# Altium PCB updated_pcb_file.PcbDoc (part 1 of 5)
Units mil, origin at the board's own origin, x right, y up, seen from the top; angles counter-clockwise.
Board outline 3385.83 x 2125.98 mil, 4 copper layers (L1 (TOP), L2 (GND), L3 (PWR), L4 (BOTTOM)), stack 38.228 mil thick; 154 components, 143 nets, 726 pads, 326 vias.
Unrouted connection lines stored in the file: 46.
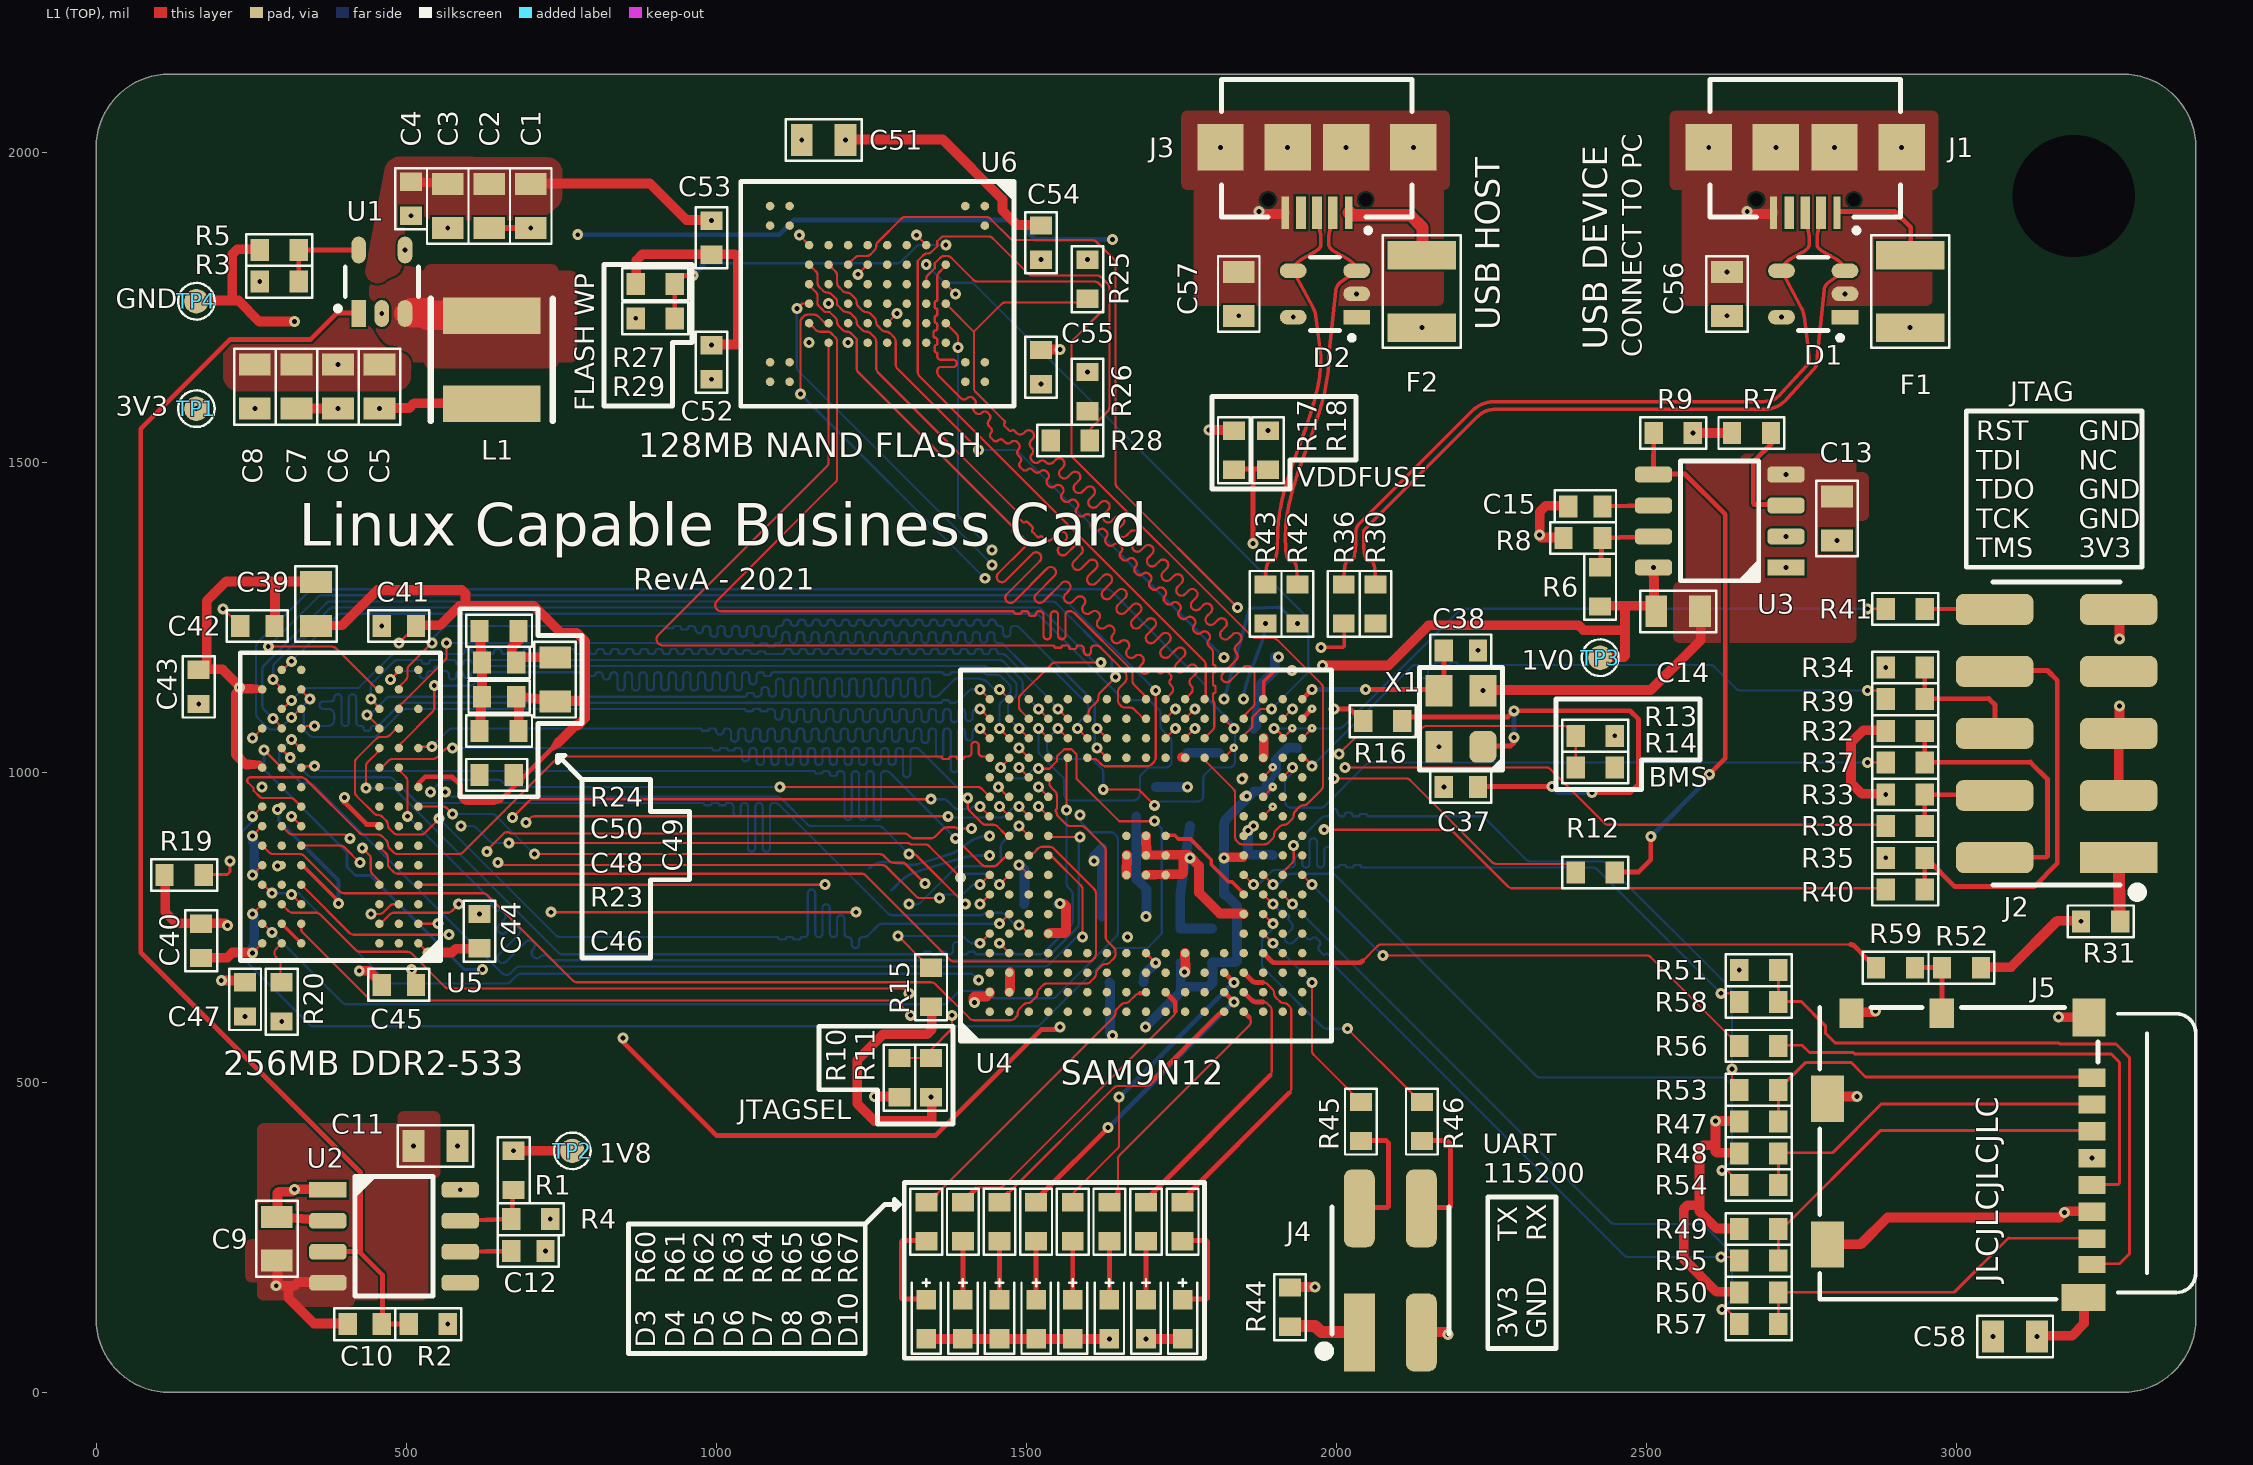
[diagram p0: L1 (TOP) view]
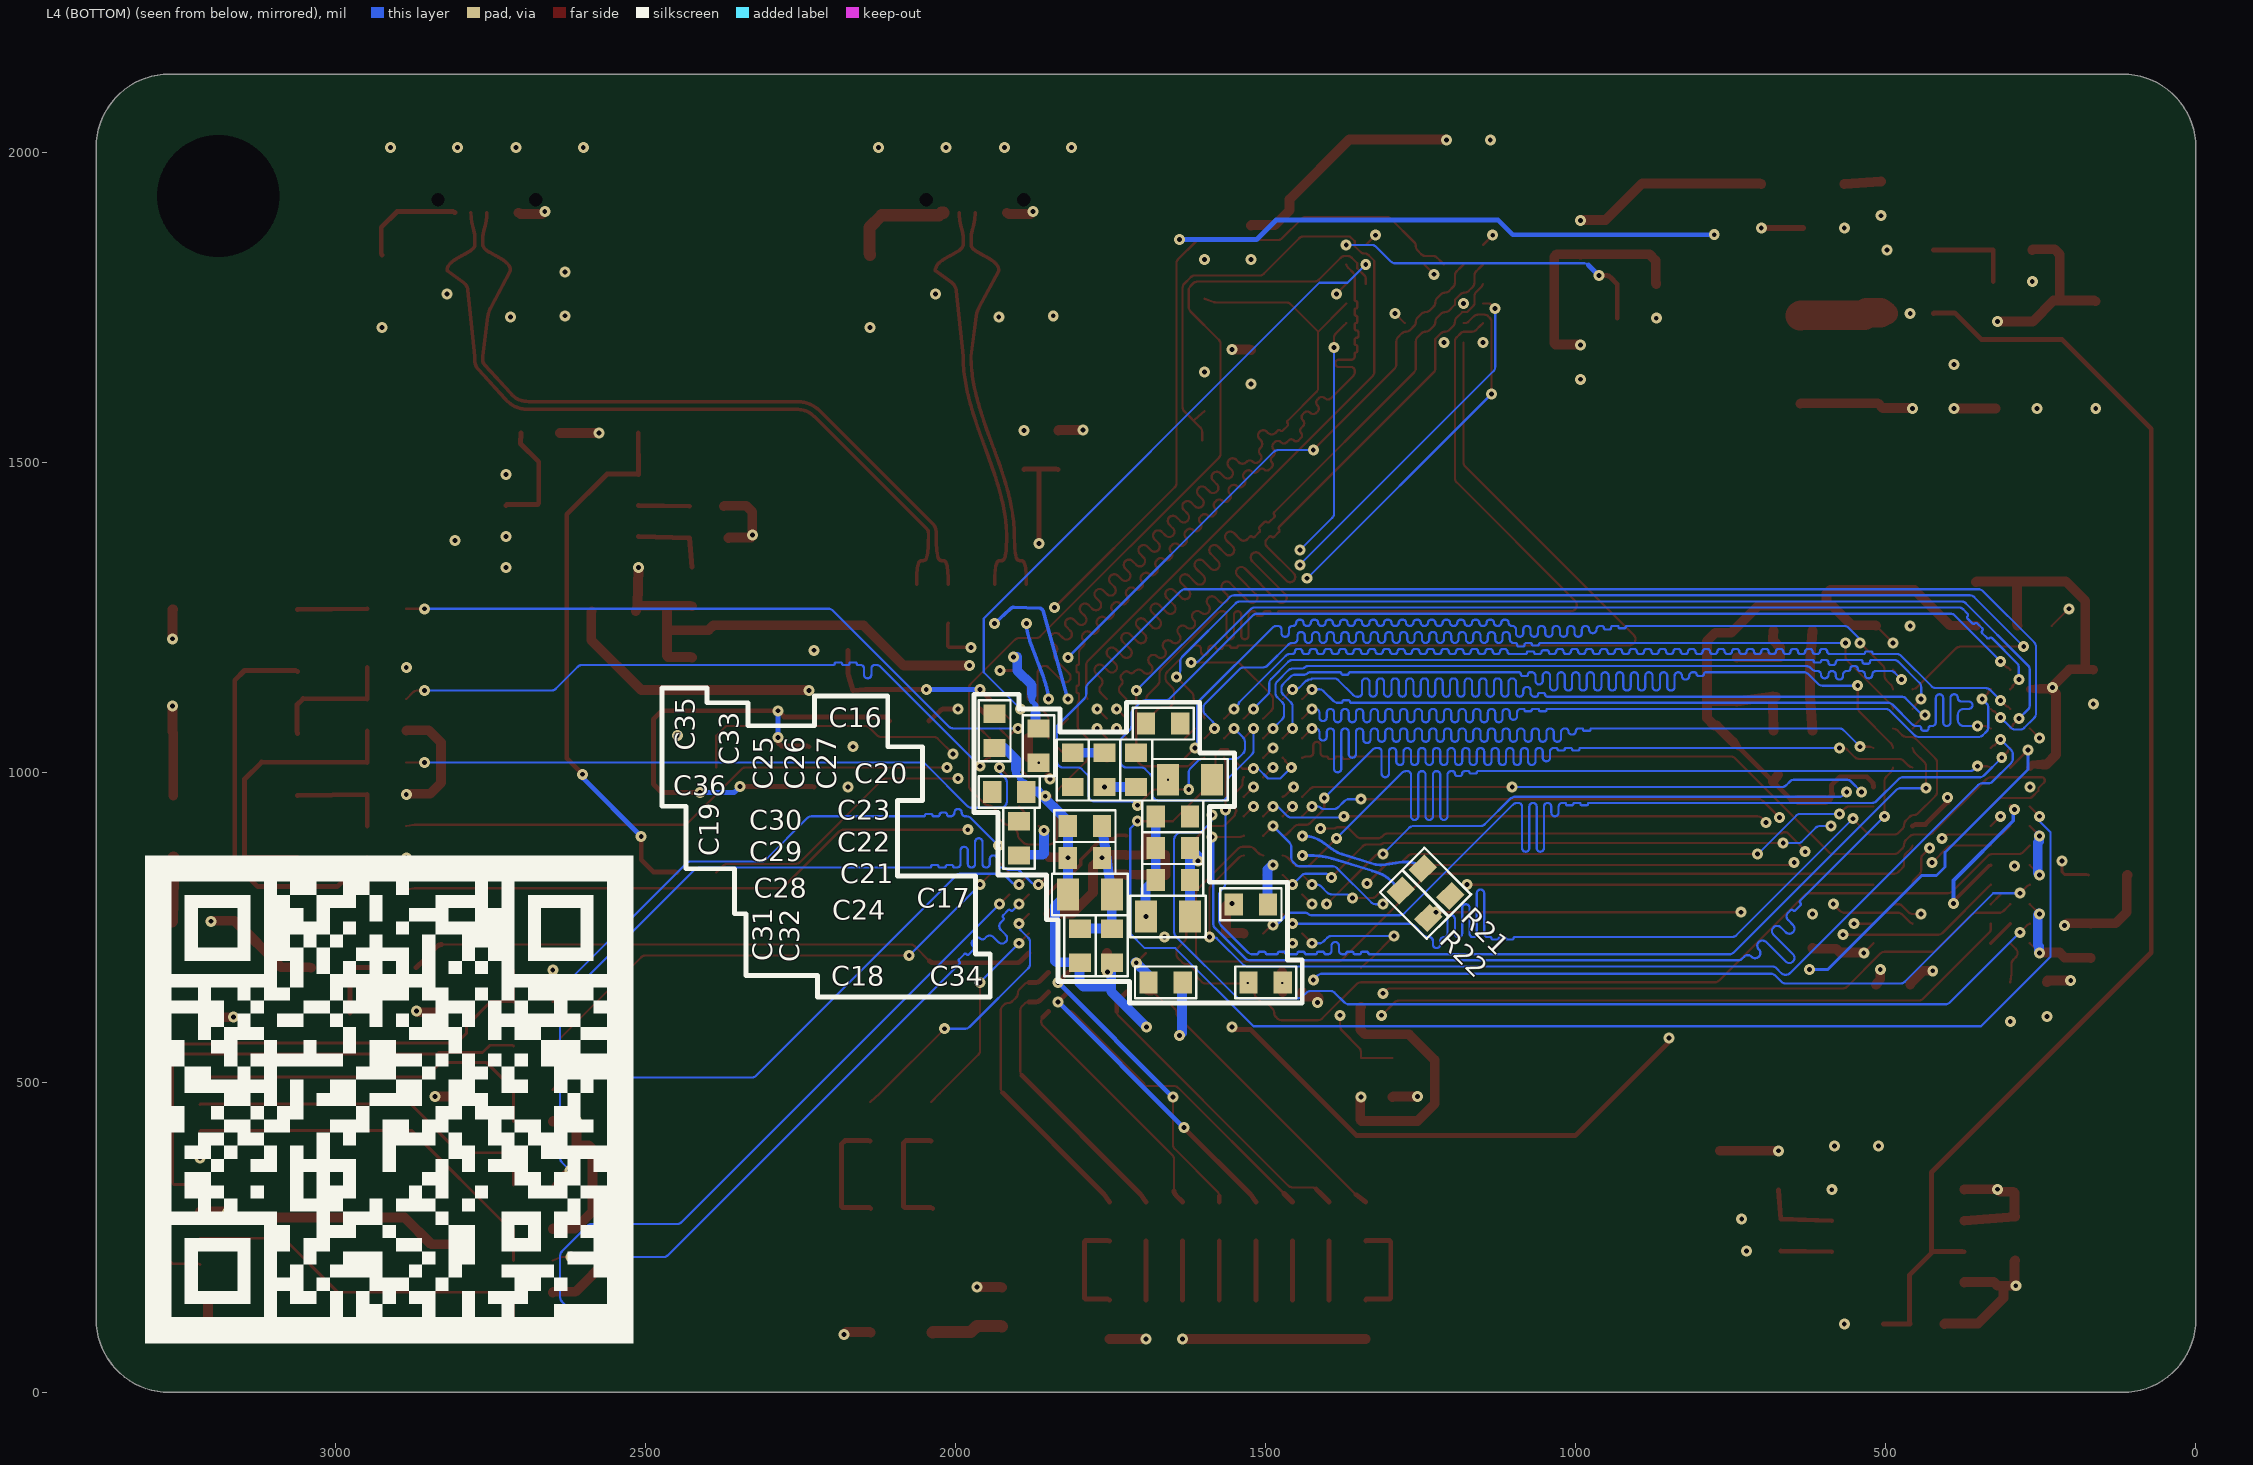
[diagram p1: L4 (BOTTOM) view, seen from below]
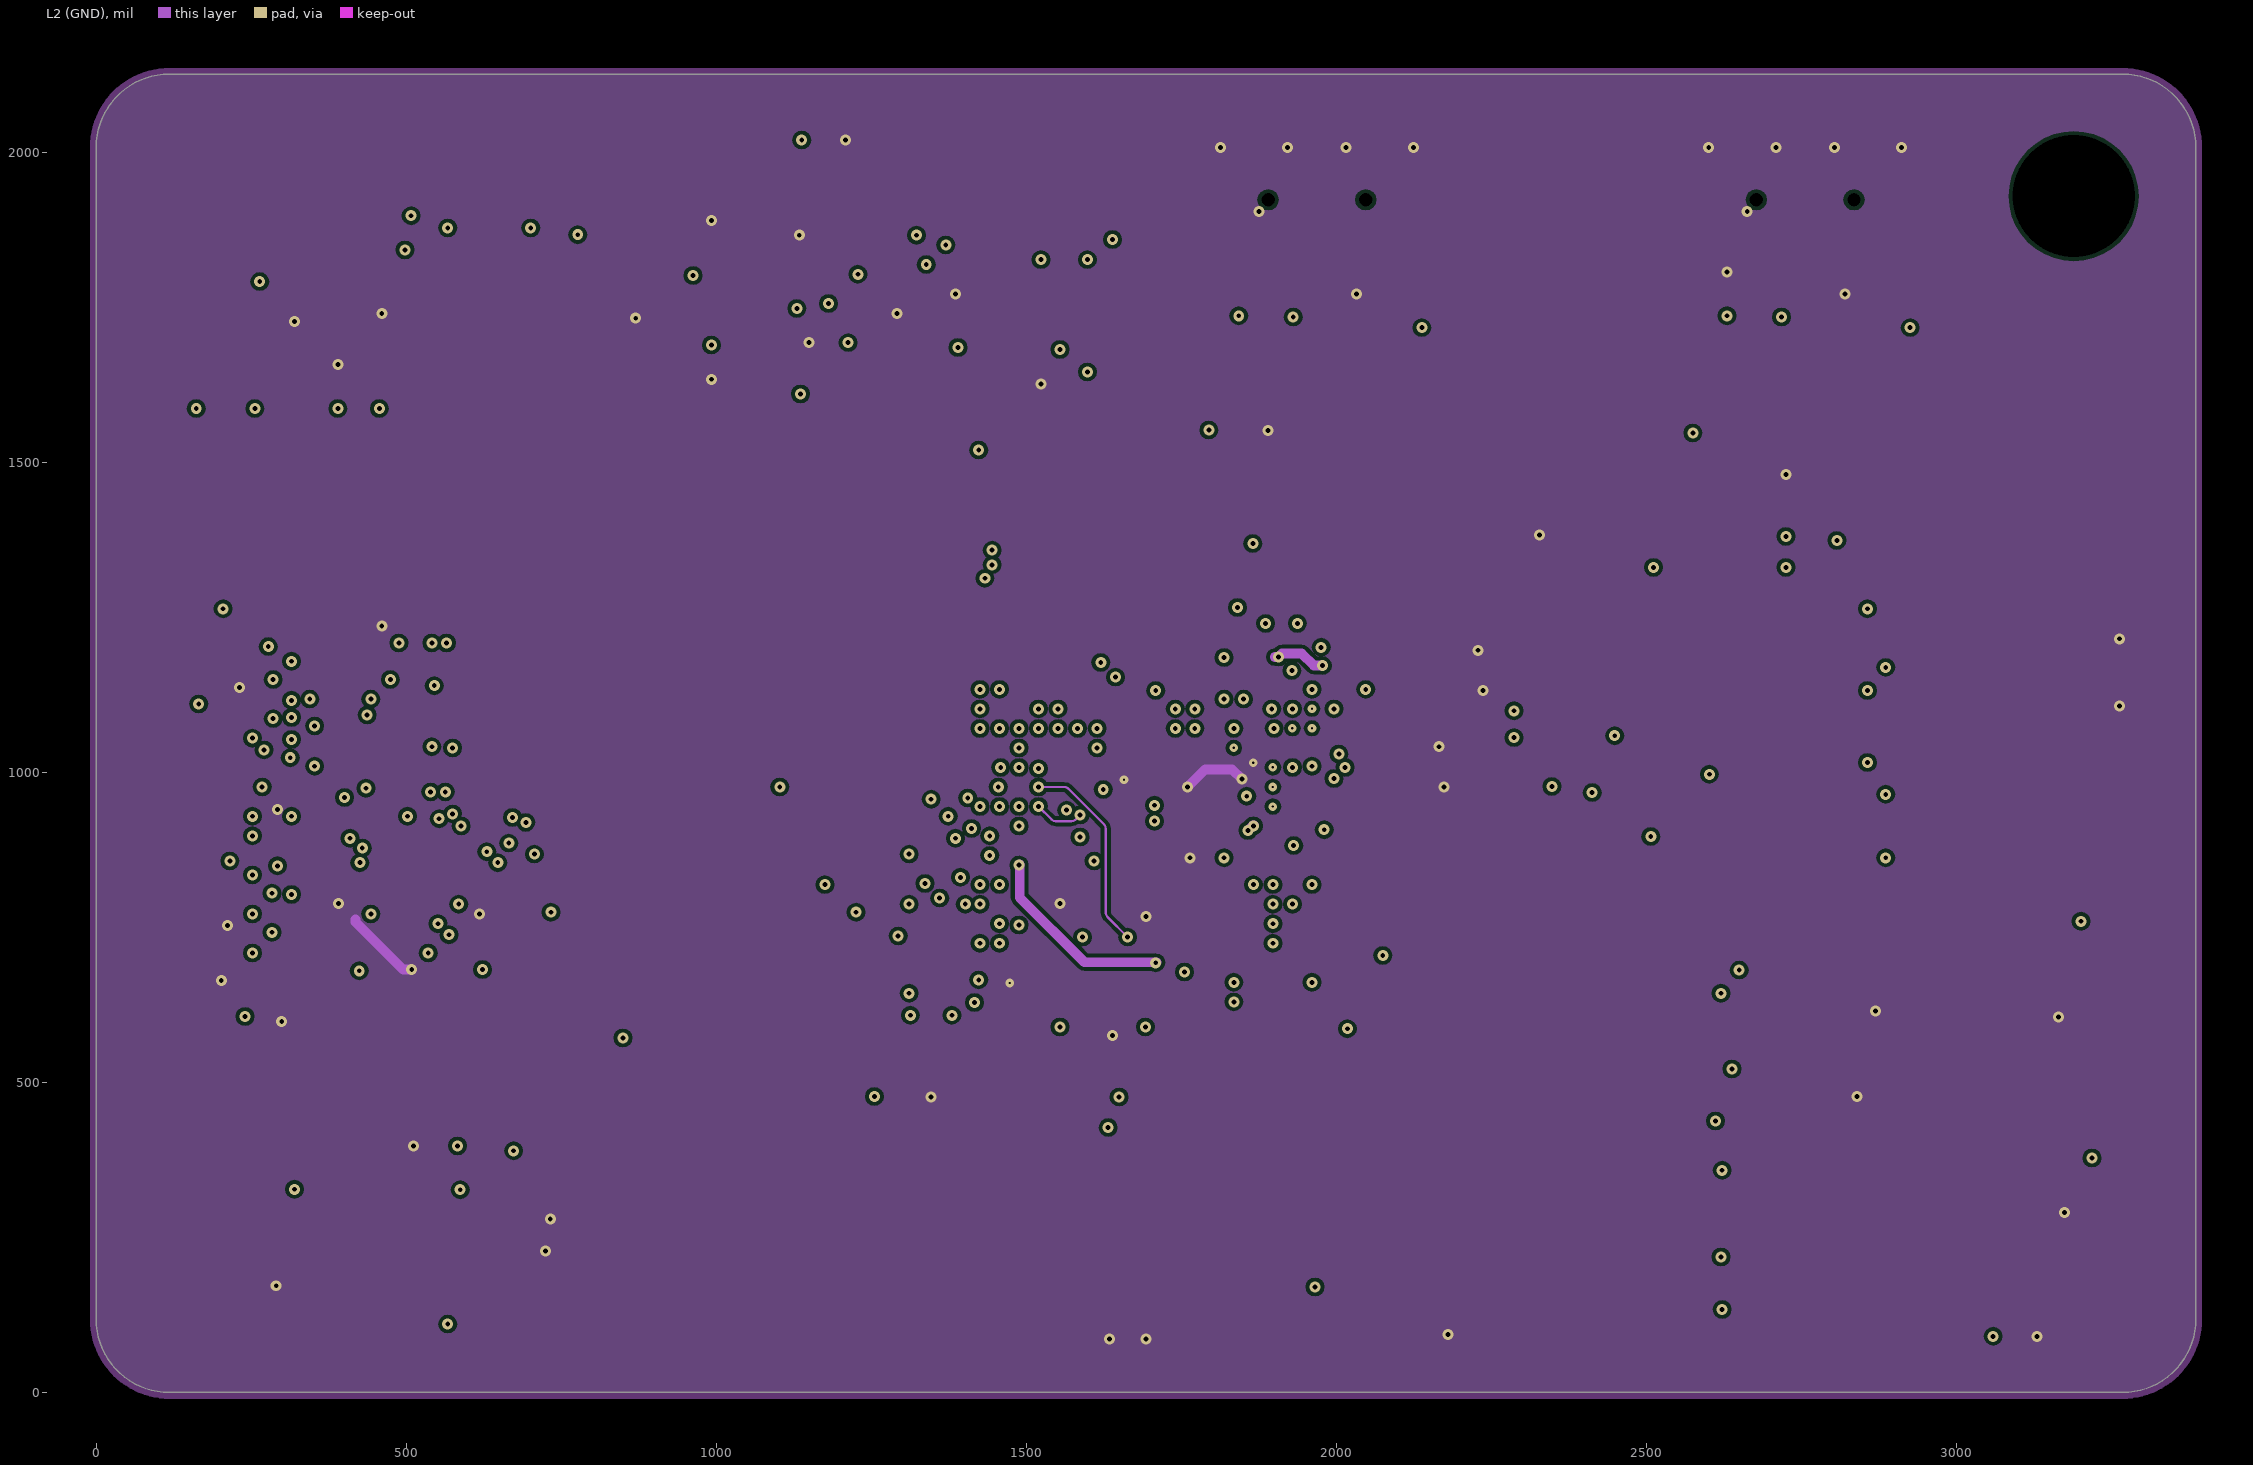
[diagram p2: L2 (GND)]
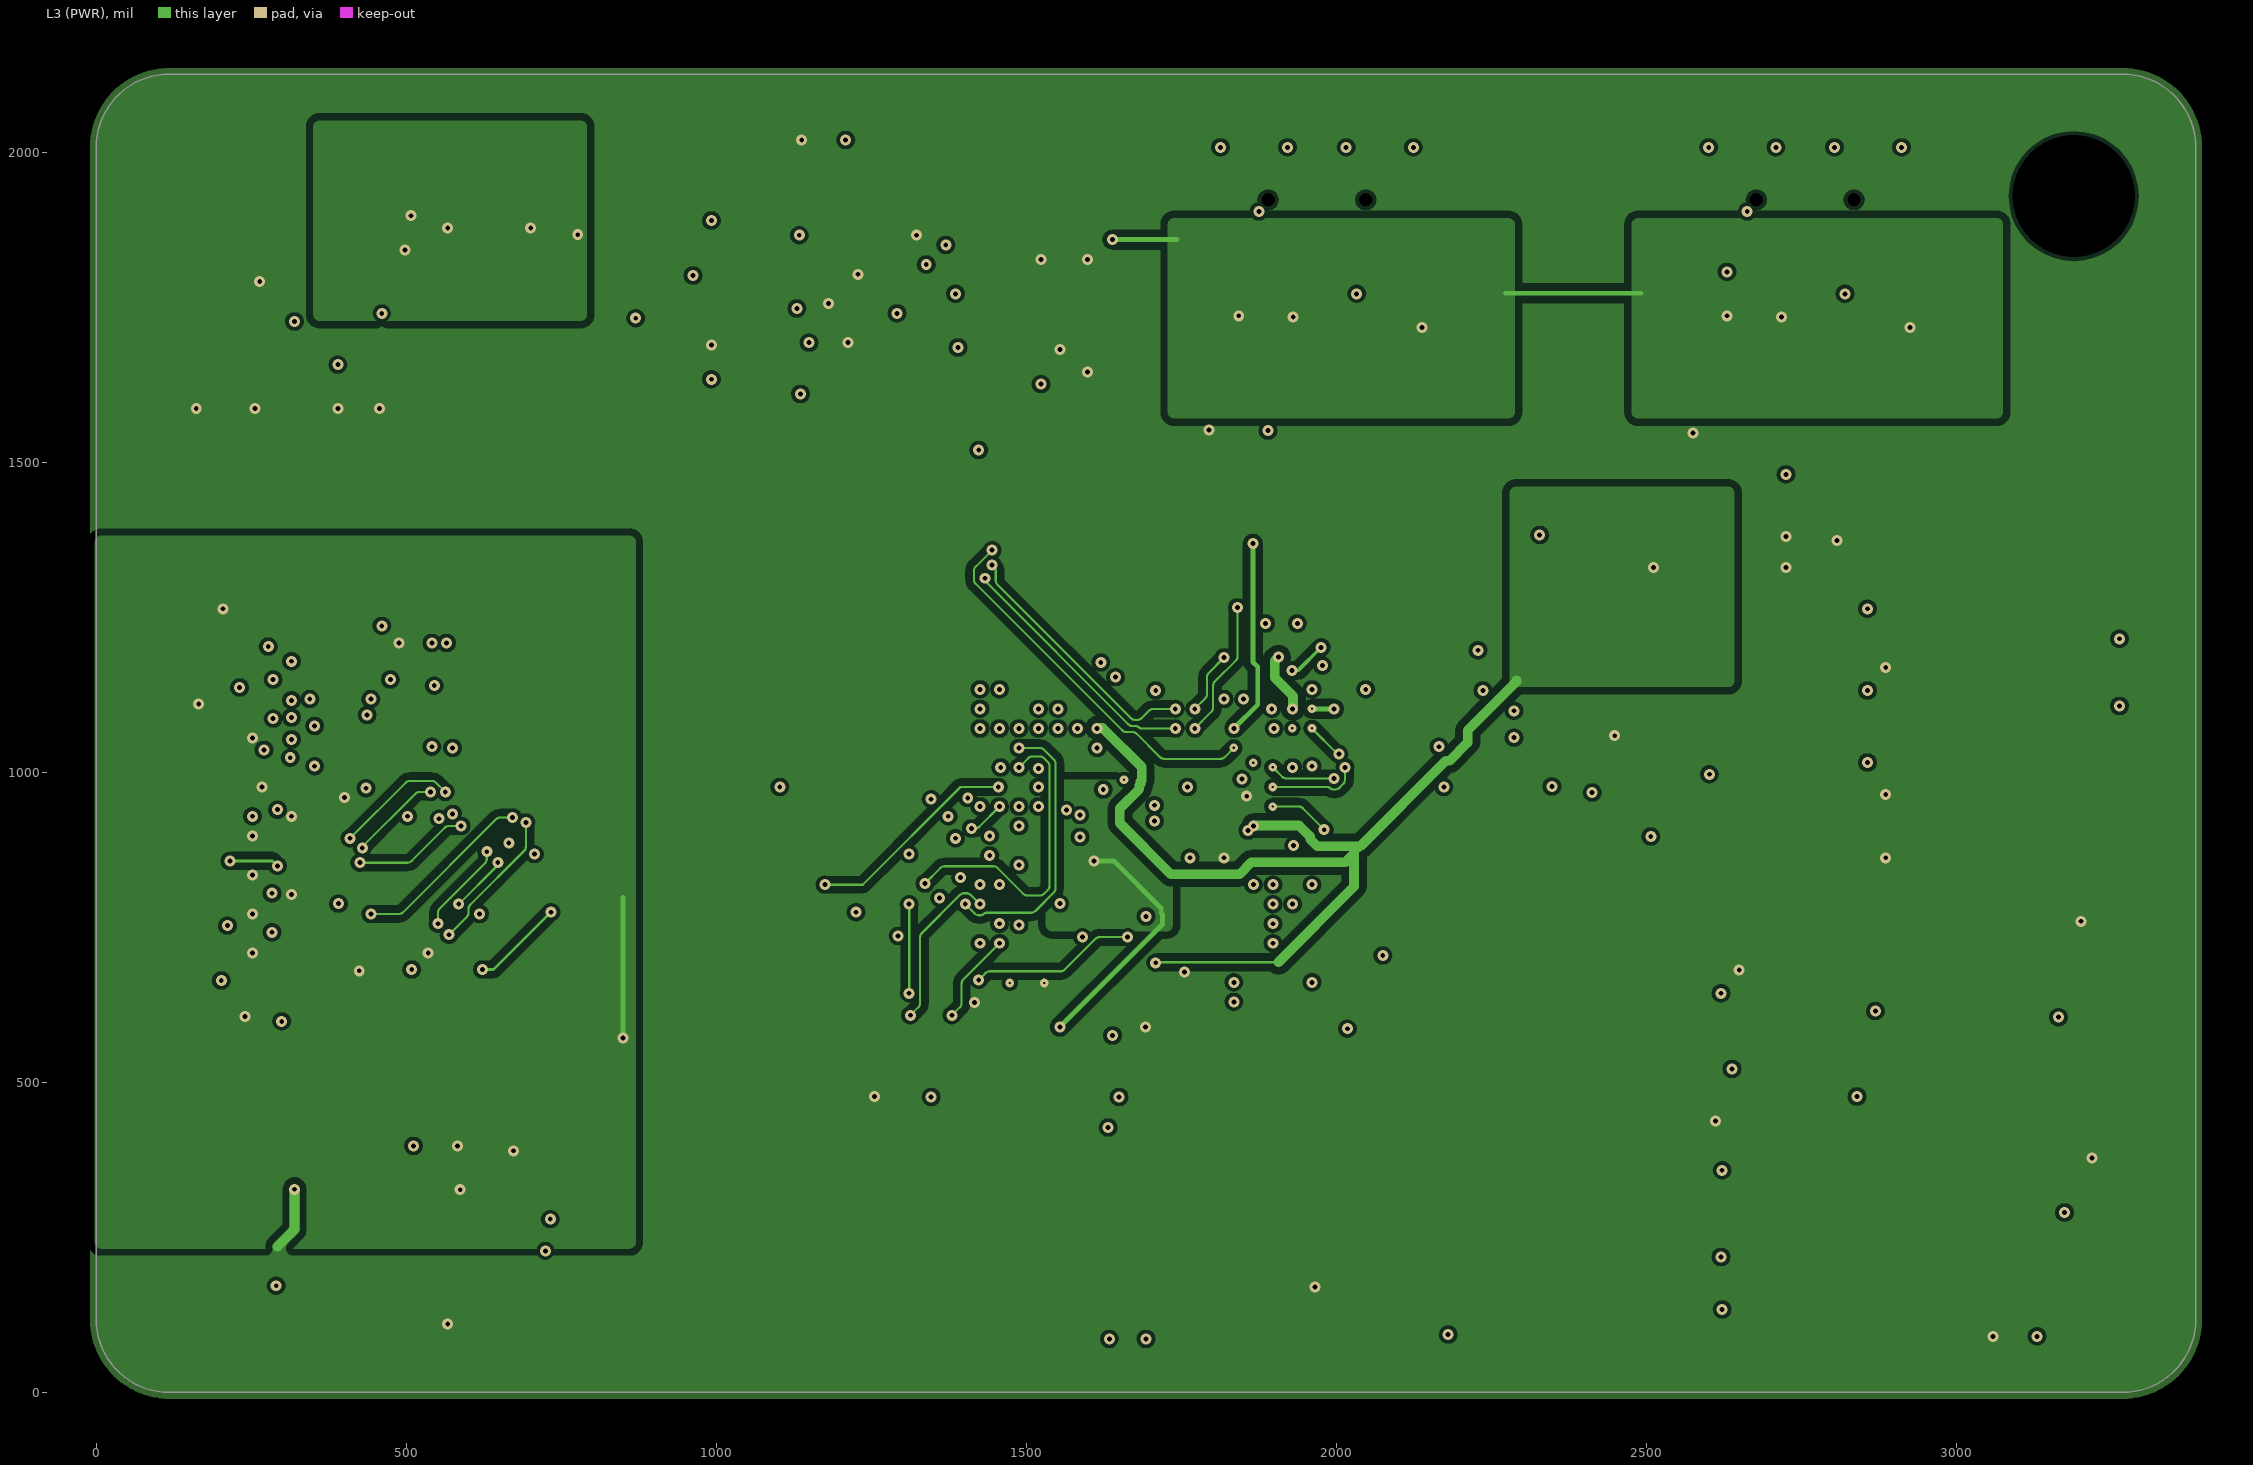
[diagram p3: L3 (PWR)]
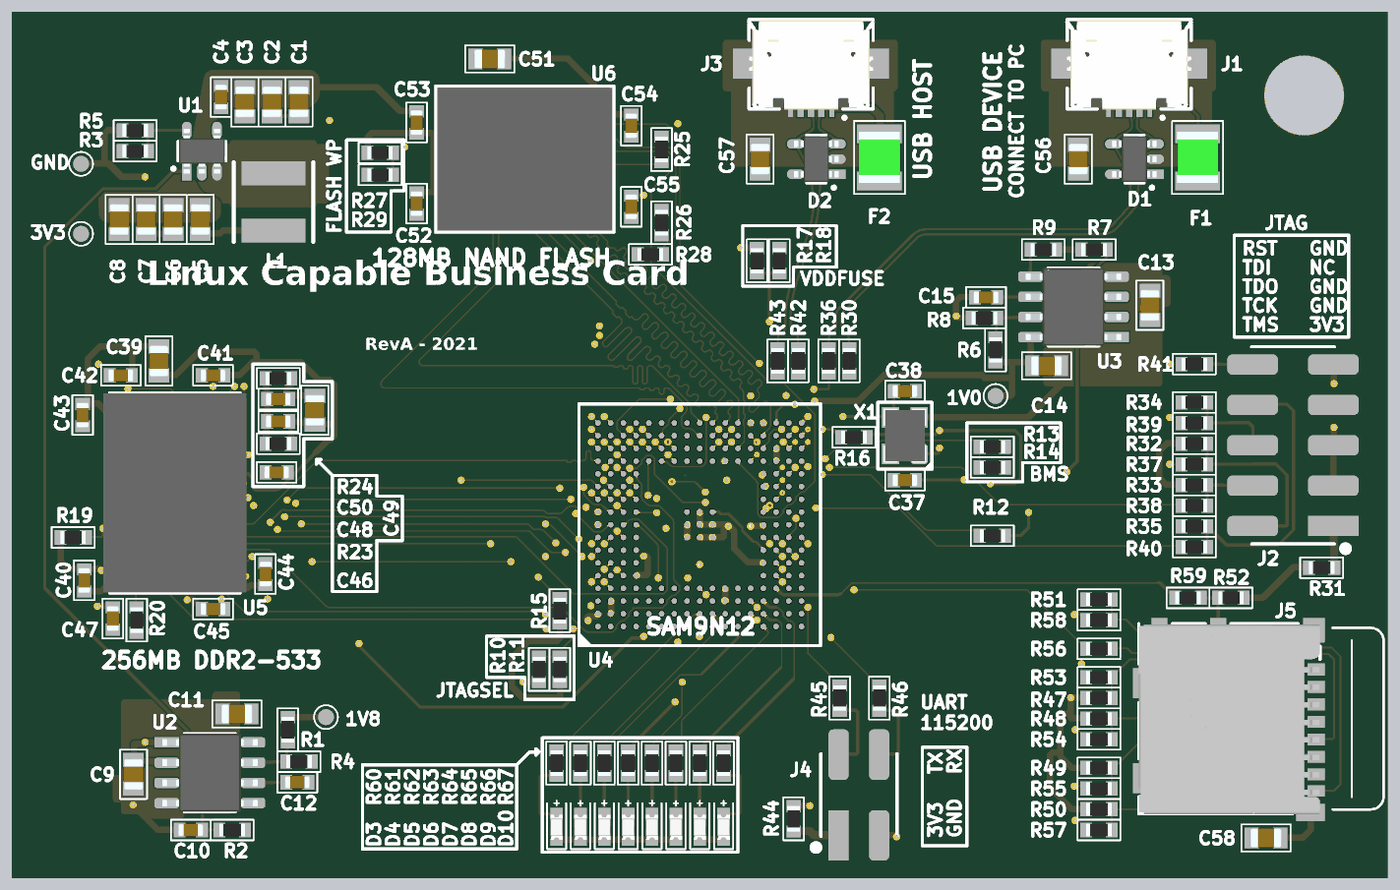
[diagram p8: 3D render of the assembled board from above, using the file's embedded part models]
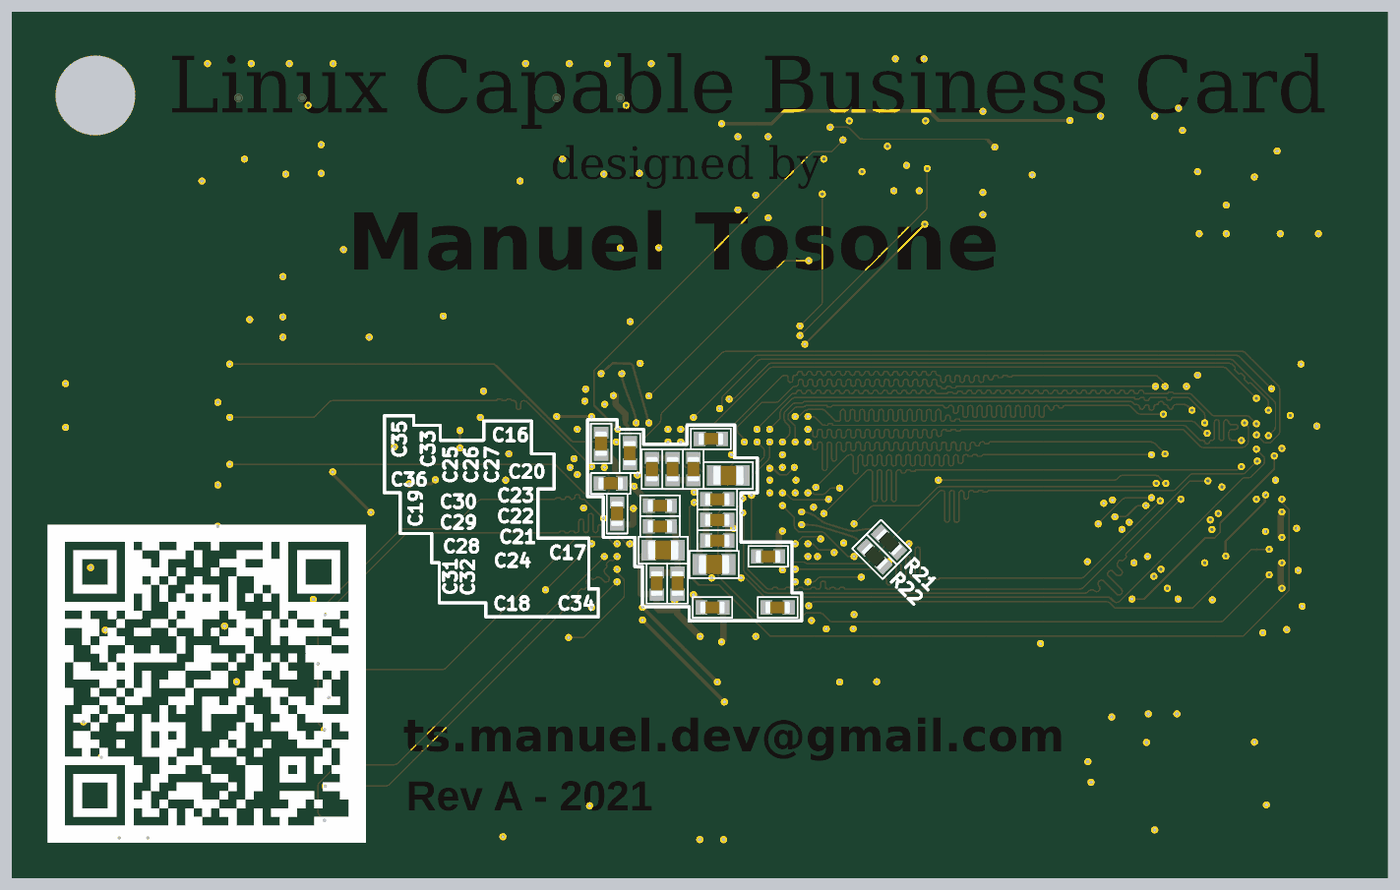
[diagram p9: 3D render of the assembled board from below, using the file's embedded part models]

## Layer stack, top to bottom
Top Solder: solder mask 0.7874, Solder Resist, Dk 3.8
L1 (TOP): signal copper 1.378
Dielectric 2: prepreg 3.937, PP-006, Dk 4.05
L2 (GND): signal copper 0.7087
Dielectric 1: core 26.1811, Core-009, Dk 4.5
L3 (PWR): signal copper 0.7087
Dielectric 3: prepreg 3.937, PP-006, Dk 4.05
L4 (BOTTOM): signal copper 1.378
Bottom Solder: solder mask 0.7874, Solder Resist, Dk 3.8

## Board outline
0,118.11 0,2007.87 cw(c118.11,2007.87) 118.11,2125.98 3267.72,2125.98 cw(c3267.72,2007.87) 3385.83,2007.87 3385.83,118.11 cw(c3267.72,118.11) 3267.72,0 118.11,0 cw(c118.11,118.11)

## Design rules (kind name [scope] priority, off if disabled: settings)
Clearance Clearance_PowerPoly [OnLayer('L3 (PWR)') vs IsRegion] p1: gap=11.81 ignorepadtopadclearanceinfootprint=FALSE
Clearance Clearance_TOP_BOTTOM [OnLayer('L1 (TOP)') or OnLayer('L4 (BOTTOM)')] p2: gap=3.54 ignorepadtopadclearanceinfootprint=FALSE
Clearance [All] p3: gap=5.91 ignorepadtopadclearanceinfootprint=FALSE
DiffPairsRouting DiffPair_90 [InDifferentialPairClass('DIFF90')] p1: maxlimit=5.98 minlimit=5.98 mostfreqgap=5.98 toplayer_minwidth=5.55 toplayer_maxwidth=5.55 toplayer_prefwidth=5.55 midlayer1_minwidth=5.55 midlayer1_maxwidth=5.55 midlayer1_prefwidth=5.55 midlayer2_minwidth=5.55 midlayer2_maxwidth=5.55 midlayer2_prefwidth=5.55 bottomlayer_minwidth=5.55 bottomlayer_maxwidth=5.55 bottomlayer_prefwidth=5.55 maxuncoupledlength=500
DiffPairsRouting DiffPair_100 [InDifferentialPairClass('DIFF100')] p2: maxlimit=5.98 minlimit=5.98 mostfreqgap=5.98 toplayer_minwidth=4.33 toplayer_maxwidth=4.33 toplayer_prefwidth=4.33 midlayer1_minwidth=4.33 midlayer1_maxwidth=4.33 midlayer1_prefwidth=4.33 midlayer2_minwidth=4.33 midlayer2_maxwidth=4.33 midlayer2_prefwidth=4.33 bottomlayer_minwidth=4.33 bottomlayer_maxwidth=4.33 bottomlayer_prefwidth=4.33 maxuncoupledlength=500
HoleSize [All] p1: absolutevalues=TRUE maxlimit=236.22 minlimit=7.87 maxpercent=80.000 minpercent=20.000
HoleToHoleClearance [All] p1: gap=7.87 allowstackedmicrovias=TRUE
MatchedLengths FLASH [InxSignalClass('FLASH')] p1: tolerance=200 checknetsindiffpair=FALSE checkdiffpairvsdiffpair=TRUE checkxsignals=TRUE checkothers=TRUE
MatchedLengths DRAM_DIFF [InxSignalClass('DRAM_ADDR_CTRL')] p2: tolerance=5 checknetsindiffpair=TRUE checkdiffpairvsdiffpair=FALSE checkxsignals=FALSE checkothers=FALSE
MatchedLengths DRAM_ADDR_CTRL [InxSignalClass('DRAM_ADDR_CTRL')] p3: tolerance=100 checknetsindiffpair=FALSE checkdiffpairvsdiffpair=TRUE checkxsignals=TRUE checkothers=TRUE
MatchedLengths DRAM_DATA_BANK0 [InxSignalClass('DRAM_BANK0')] p4: tolerance=25 checknetsindiffpair=FALSE checkdiffpairvsdiffpair=TRUE checkxsignals=TRUE checkothers=TRUE
MatchedLengths DRAM_DATA_BANK1 [InxSignalClass('DRAM_BANK1')] p5: tolerance=25 checknetsindiffpair=FALSE checkdiffpairvsdiffpair=TRUE checkxsignals=TRUE checkothers=TRUE
MinimumSolderMaskSliver MinimumSolderMaskSliver_USB [HasFootprint('UJ2-MIBH-G-SMT-TR')] p1: minsoldermaskwidth=5.91
MinimumSolderMaskSliver [All] p2: minsoldermaskwidth=7.87
PlaneClearance [All] p1: clearance=7.87
PlaneConnect [All] p1: planeconnectstyle=Direct reliefexpansion=20 reliefentries=4 reliefconductorwidth=10 reliefairgap=10
PolygonConnect [All] p1: connectstyle=Direct reliefconductorwidth=3.54 reliefentries=2 polygonreliefangle="90 Angle" airgapwidth=10
RoutingVias [All] p1: holewidth=7.87 width=17.72 viastyle="Through Hole" minholewidth=3.94 minwidth=13.78 maxholewidth=7.87 maxwidth=17.72
SilkToSilkClearance [All] p1: silktosilkclearance=5.91
SilkToSolderMaskClearance [IsPad] p1: minsilkscreentomaskgap=3.94 clearancetoexposedcopper=TRUE
SolderMaskExpansion [All] p1: expansion=0 istentingtop=FALSE
Width [All] p1: maxlimit=157.48 minlimit=3.54 preferedwidth=4.72
22 further rules are at their usual default settings.

## Classes and differential pairs
net class POWER: +1V0 +1V8 +3V3 +5V_VBUS GND
net class DRAM_BANK0: DRAM_D0 DRAM_D1 DRAM_D2 DRAM_D3 DRAM_D4 DRAM_D5 DRAM_D6 DRAM_D7 DRAM_LDM DRAM_LDQSn DRAM_LDQSp
net class DRAM_BANK1: DRAM_D8 DRAM_D9 DRAM_D10 DRAM_D11 DRAM_D12 DRAM_D13 DRAM_D14 DRAM_D15 DRAM_UDM DRAM_UDQSn DRAM_UDQSp
net class DRAM_ADDR_CTRL: DRAM_A0 DRAM_A1 DRAM_A2 DRAM_A3 DRAM_A4 DRAM_A5 DRAM_A6 DRAM_A7 DRAM_A8 DRAM_A9 DRAM_A10 DRAM_A11 DRAM_A12 DRAM_A13 DRAM_BA0 DRAM_BA1 DRAM_BA2 DRAM_CAS DRAM_CKE DRAM_CS DRAM_RAS DRAM_WE
differential pair class DIFF100: DRAM_CLK DRAM_CLK_R SDCK
differential pair class DIFF90: DD HD USB_D USB_H USBD USBH
net class USB: USB_D_N USB_D_P USB_H_N USB_H_P USBD_N USBD_P USBH_N USBH_P
net class SD: SD_CLK SD_CMD SD_DAT0 SD_DAT1 SD_DAT2 SD_DAT3 SD_R_CLK SD_R_CMD SD_R_DAT0 SD_R_DAT1 SD_R_DAT2 SD_R_DAT3
net class JTAG: JTAG_J_RSTn JTAG_J_TCK JTAG_J_TDI JTAG_J_TDO JTAG_J_TMS JTAG_TCK JTAG_TDI JTAG_TDO JTAG_TMS NTRST
net class FLASH_DATA: FLASH_D0 FLASH_D1 FLASH_D2 FLASH_D3 FLASH_D4 FLASH_D5 FLASH_D6 FLASH_D7
net class FLASH_D[0..7]: FLASH_D0 FLASH_D1 FLASH_D2 FLASH_D3 FLASH_D4 FLASH_D5 FLASH_D6 FLASH_D7
net class FLASH_CMD: FLASH_ALE FLASH_CLE FLASH_CS FLASH_OE FLASH_RDY FLASH_WE
net class DRAM_D[0..15]: DRAM_D0 DRAM_D1 DRAM_D2 DRAM_D3 DRAM_D4 DRAM_D5 DRAM_D6 DRAM_D7 DRAM_D8 DRAM_D9 DRAM_D10 DRAM_D11 DRAM_D12 DRAM_D13 DRAM_D14 DRAM_D15
net class DRAM_CLK: DRAM_CLK_N DRAM_CLK_P DRAM_CLK_R_N DRAM_CLK_R_P
net class DRAM_A[0..13]: DRAM_A0 DRAM_A1 DRAM_A2 DRAM_A3 DRAM_A4 DRAM_A5 DRAM_A6 DRAM_A7 DRAM_A8 DRAM_A9 DRAM_A10 DRAM_A11 DRAM_A12 DRAM_A13
component class "[09] - CPU GPIO": D3 D4 D5 D6 D7 D8 D9 D10 R60 R61 R62 R63 R64 R65 R66 R67
component class "[08] - CONNECTORS": C56 C57 C58 D1 D2 F1 F2 J1 J2 J3 J4 J5 R30 R31 R32 R33 R34 R35 R36 R37 R38 R39 R40 R41 R42 R43 R44 R45 R46 R47 R48 R49 R50 R51 R52 R53 R54 R55 R56 R57 R58 R59
component class "[07] - NAND FLASH": C51 C52 C53 C54 C55 R25 R26 R27 R28 R29 U6
component class "[06] - RAM DDR2": C39 C40 C41 C42 C43 C44 C45 C46 C47 C48 C49 C50 R19 R20 R21 R22 R23 R24 U5
component class "[04] - CPU POWER": C16 C17 C18 C19 C20 C21 C22 C23 C24 C25 C26 C27 C28 C29 C30 C31 C32 C33 C34 C35 C36 C37 C38 R10 R11 R12 R13 R14 R15 R16 R17 R18 U4 X1
component class "[03] - POWER SUPPLIES": C1 C2 C3 C4 C5 C6 C7 C8 C9 C10 C11 C12 C13 C14 C15 L1 R1 R2 R3 R4 R5 R6 R7 R8 R9 TP1 TP2 TP3 TP4 U1 U2 U3
differential pair DRAM_CLK: +DRAM_CLK_P -DRAM_CLK_N
differential pair USBH: +USBH_P -USBH_N
differential pair USBD: +USBD_P -USBD_N
differential pair DRAM_CLK_R: +DRAM_CLK_R_P -DRAM_CLK_R_N
differential pair USB_H: +USB_H_P -USB_H_N
differential pair USB_D: +USB_D_P -USB_D_N

## Components (designator, comment, footprint, x,y, rotation, side; value= is the part's Value field where it differs from the comment)
C1 "885012107013" CAP-0805 700.83,1913.24 r270 top value=4.7uF
C2 "885012107013" CAP-0805 633.9,1913.24 r270 top value=4.7uF
C3 "885012107013" CAP-0805 566.97,1913.24 r270 top value=4.7uF
C4 "C0603C104M4RAC" CAP-0603 507.92,1925.06 r270 top value=100nF
C5 "885012107013" CAP-0805 456.74,1621.91 r270 top value=4.7uF
C6 "885012107013" CAP-0805 389.81,1621.91 r270 top value=4.7uF
C7 "885012107013" CAP-0805 322.88,1621.91 r270 top value=4.7uF
C8 "885012107013" CAP-0805 255.95,1621.91 r270 top value=4.7uF
C9 "885012107013" CAP-0805 291.38,247.89 r90 top value=4.7uF
C10 "C0603C104M4RAC" CAP-0603 433.11,110.09 r0 top value=100nF
C11 "885012107013" CAP-0805 547.29,397.5 r0 top value=4.7uF
C12 "C0603C102J5RACTU" CAP-0603 696.89,228.2 r180 top value=1nF
C13 "885012107013" CAP-0805 2807.13,1409.31 r270 top value=4.7uF
C14 "885012107013" CAP-0805 2551.22,1259.7 r180 top value=4.7uF
C15 "C0603C102J5RACTU" CAP-0603 2401.62,1428.99 r0 top value=1nF
C16 "C0603C104M4RAC" CAP-0603 1665.4,1078.6 r180 bottom value=100nF
C17 "C0603C104M4RAC" CAP-0603 1523.67,787.26 r180 bottom value=100nF
C18 "C0603C104M4RAC" CAP-0603 1661.46,661.28 r0 bottom value=100nF
C19 "C0603C104M4RAC" CAP-0603 1897.68,893.56 r270 bottom value=100nF
C20 "885012107013" CAP-0805 1622.09,988.05 r180 bottom value=4.7uF
C21 "C0603C104M4RAC" CAP-0603 1649.65,826.63 r180 bottom value=100nF
C22 "C0603C104M4RAC" CAP-0603 1649.65,877.81 r180 bottom value=100nF
C23 "C0603C104M4RAC" CAP-0603 1649.65,928.99 r180 bottom value=100nF
C24 "885012107013" CAP-0805 1657.52,767.57 r180 bottom value=4.7uF
C25 "C0603C104M4RAC" CAP-0603 1811.07,1003.8 r90 bottom value=100nF
C26 "C0603C104M4RAC" CAP-0603 1759.89,1003.8 r90 bottom value=100nF
C27 "C0603C104M4RAC" CAP-0603 1708.7,1003.8 r90 bottom value=100nF
C28 "885012107013" CAP-0805 1783.51,803.01 r0 bottom value=4.7uF
C29 "C0603C104M4RAC" CAP-0603 1791.38,862.06 r0 bottom value=100nF
C30 "C0603C104M4RAC" CAP-0603 1791.38,913.24 r0 bottom value=100nF
C31 "C0603C104M4RAC" CAP-0603 1799.26,720.33 r270 bottom value=100nF
C32 "C0603C104M4RAC" CAP-0603 1748.07,720.33 r270 bottom value=100nF
C33 "C0603C104M4RAC" CAP-0603 1866.19,1043.17 r90 bottom value=100nF
C34 "C0603C104M4RAC" CAP-0603 1500.04,661.28 r0 bottom value=100nF
C35 "C0603C104M4RAC" CAP-0603 1937.05,1066.79 r270 bottom value=100nF
C36 "C0603C104M4RAC" CAP-0603 1913.43,968.36 r180 bottom value=100nF
C37 "885012006054" CAP-0603 2200.83,976.24 r0 top value=33pF
C38 "885012006054" CAP-0603 2200.83,1196.71 r180 top value=33pF
C39 "885012107013" CAP-0805 354.37,1271.51 r270 top value=4.7uF
C40 "C0603C104M4RAC" CAP-0603 169.33,728.2 r270 top value=100nF
C41 "C0603C104M4RAC" CAP-0603 488.23,1236.08 r0 top value=100nF
C42 "C0603C104M4RAC" CAP-0603 259.89,1236.08 r180 top value=100nF
C43 "C0603C104M4RAC" CAP-0603 165.4,1137.65 r270 top value=100nF
C44 "C0603C104M4RAC" CAP-0603 618.15,743.95 r270 top value=100nF
C45 "C0603C104M4RAC" CAP-0603 488.23,657.34 r180 top value=100nF
C46 "C0603C104M4RAC" CAP-0603 645.71,995.92 r0 top value=100nF
C47 "C0603C104M4RAC" CAP-0603 240.2,633.72 r270 top value=100nF
C48 "C0603C104M4RAC" CAP-0603 649.65,1121.91 r0 top value=100nF
C49 "885012107013" CAP-0805 740.2,1149.46 r270 top value=4.7uF
C50 "C0603C104M4RAC" CAP-0603 649.65,1177.02 r180 top value=100nF
C51 "885012107013" CAP-0805 1173.27,2019.54 r180 top value=4.7uF
C52 "C0603C104M4RAC" CAP-0603 992.17,1661.28 r90 top value=100nF
C53 "C0603C104M4RAC" CAP-0603 992.17,1862.06 r270 top value=100nF
C54 "C0603C104M4RAC" CAP-0603 1523.67,1854.19 r270 top value=100nF
C55 "C0603C104M4RAC" CAP-0603 1523.67,1653.4 r90 top value=100nF
C56 "885012107013" CAP-0805 2629.96,1771.51 r270 top value=4.7uF
C57 "885012107013" CAP-0805 1842.56,1771.51 r270 top value=4.7uF
C58 "885012107013" CAP-0805 3094.53,90.41 r180 top value=4.7uF
D1 "PGB102ST23" SOT23-5 2768.94,1771.51 r180 top
D2 "PGB102ST23" SOT23-5 1981.54,1771.51 r180 top
D3 "150060VS75000" LED-SMD-0603-1.6X0.8 1338.63,117.77 r90 top value=Green
D4 "150060VS75000" LED-SMD-0603-1.6X0.8 1397.68,117.77 r90 top value=Green
D5 "150060VS75000" LED-SMD-0603-1.6X0.8 1456.74,117.77 r90 top value=Green
D6 "150060VS75000" LED-SMD-0603-1.6X0.8 1515.79,117.77 r90 top value=Green
D7 "150060VS75000" LED-SMD-0603-1.6X0.8 1574.85,117.77 r90 top value=Green
D8 "150060VS75000" LED-SMD-0603-1.6X0.8 1633.9,117.77 r90 top value=Green
D9 "150060VS75000" LED-SMD-0603-1.6X0.8 1692.96,117.77 r90 top value=Green
D10 "150060VS75000" LED-SMD-0603-1.6X0.8 1752.01,117.77 r90 top value=Green
F1 "0ZCH0050FF2G" FUS-0ZCH-3x2.35 2925.24,1775.45 r270 top value=500mA
F2 "0ZCH0050FF2G" FUS-0ZCH-3x2.35 2137.84,1775.45 r270 top value=500mA
J1 "USB Micro B" UJ2-MIBH-G-SMT-TR 2755.95,2007.73 r180 top locked
J2 "10129383-910002ALF" "HEADER-5X2-2.54-SMD- 10129383" 3161.46,1062.65 r90 top locked
J3 "USB Micro B" UJ2-MIBH-G-SMT-TR 1968.55,2007.73 r180 top locked
J4 "10129383-904001ALF" "HEADER-2X2-2.54-SMD- 10129383" 2086.85,196.71 r0 top locked
J5 "Micro SD" 104031-0811 3228.29,393.36 r90 top locked
L1 "NRS5020T2R2NMG5" NRS5020-SMT-INDUCTOR 637.84,1665.21 r270 top value=2.2uH
R1 "RT0603FRE07412KL" RES-0603 673.27,358.13 r90 top value=412K
R2 "RT0603FRE07120KL" RES-0603 535.48,110.09 r0 top value=120K
R3 "RT0603FRE07536KL" RES-0603 295.32,1791.2 r0 top value=536K
R4 "RT0603FRE07120KL" RES-0603 700.83,279.39 r180 top value=120K
R5 "RT0603FRE07120KL" RES-0603 295.32,1842.38 r0 top value=120K
R6 "RT0603FRE07174KL" RES-0603 2425.24,1299.07 r270 top value=174K
R7 "RT0603FRE07120KL" RES-0603 2669.33,1547.1 r180 top value=120K
R8 "RT0603FRE07120KL" RES-0603 2397.68,1377.81 r0 top value=120K
R9 "RT0603FRE07120KL" RES-0603 2543.35,1547.1 r0 top value=120K
R10 "RT0603FRD07330RL" RES-0603 1295.32,507.73 r270 top value=330R
R11 "RT0603FRD07330RL" RES-0603 1346.5,507.73 r90 top value=330R
R12 "RT0603FRD07330RL" RES-0603 2417.37,838.44 r180 top value=330R
R13 "RT0603FRD07330RL" RES-0603 2417.37,1058.91 r0 top value=330R
R14 "RT0603FRD07330RL" RES-0603 2417.37,1007.73 r180 top value=330R
R15 "RT0603FRD07330RL" RES-0603 1346.5,653.4 r90 top value=330R
R16 "RT0603FRD07330RL" RES-0603 2074.85,1082.54 r180 top value=330R
R17 "RT0603FRD07330RL" RES-0603 1834.69,1519.54 r90 top value=330R
R18 "RT0603FRD07330RL" RES-0603 1889.81,1519.54 r270 top value=330R
R19 "RT0603FRD07330RL" RES-0603 141.78,834.5 r0 top value=330R
R20 "RT0603FRD07330RL" RES-0603 299.26,629.78 r90 top value=330R
R21 "RT0603DRD0727RL" RES-0603 1224.45,822.69 r225 bottom value=27R
R22 "RT0603DRD0727RL" RES-0603 1259.89,787.26 r225 bottom value=27R
R23 "RT0603FRD07330RL" RES-0603 649.65,1066.79 r0 top value=330R
R24 "RT0603FRD07330RL" RES-0603 649.65,1228.2 r180 top value=330R
R25 "RT0603FRE07120KL" RES-0603 1598.47,1795.13 r90 top value=120K
R26 "RT0603FRE07120KL" RES-0603 1598.47,1614.03 r90 top value=120K
R27 "RT0603FRD07330RL" RES-0603 901.62,1787.26 r180 top value=330R
R28 "RT0603DRD0727RL" RES-0603 1570.91,1535.29 r180 top value=27R
R29 "RT0603FRD07330RL" RES-0603 901.62,1732.14 r0 top value=330R
R30 "RT0603DRD0727RL" RES-0603 2063.04,1271.51 r270 top value=27R
R31 "RT0603DRD0727RL" RES-0603 3232.33,759.7 r180 top value=27R
R32 "RT0603FRE07120KL" RES-0603 2917.37,1066.79 r180 top value=120K
R33 "RT0603FRE07120KL" RES-0603 2917.37,964.43 r180 top value=120K
R34 "RT0603FRE07120KL" RES-0603 2917.37,1169.15 r180 top value=120K
R35 "RT0603FRE07120KL" RES-0603 2917.37,862.06 r180 top value=120K
R36 "RT0603DRD0727RL" RES-0603 2011.85,1271.51 r270 top value=27R
R37 "RT0603DRD0727RL" RES-0603 2917.37,1015.61 r180 top value=27R
R38 "RT0603DRD0727RL" RES-0603 2917.37,913.24 r180 top value=27R
R39 "RT0603DRD0727RL" RES-0603 2917.37,1117.97 r180 top value=27R
R40 "RT0603DRD0727RL" RES-0603 2917.37,810.88 r180 top value=27R
R41 "RT0603DRD0727RL" RES-0603 2917.37,1263.64 r180 top value=27R
R42 "RT0603DRD0727RL" RES-0603 1937.05,1271.51 r270 top value=27R
R43 "RT0603DRD0727RL" RES-0603 1885.87,1271.51 r270 top value=27R
R44 "RT0603DRD0727RL" RES-0603 1925.24,137.65 r90 top value=27R
R45 "RT0603FRD07330RL" RES-0603 2039.41,436.87 r90 top value=330R
R46 "RT0603FRD07330RL" RES-0603 2137.84,436.87 r90 top value=330R
R47 "RT0603FRE07120KL" RES-0603 2681.15,436.87 r180 top value=120K
R48 "RT0603FRE07120KL" RES-0603 2681.15,385.69 r180 top value=120K
R49 "RT0603FRE07120KL" RES-0603 2681.15,263.64 r180 top value=120K
R50 "RT0603FRE07120KL" RES-0603 2681.15,161.28 r180 top value=120K
R51 "RT0603FRE07120KL" RES-0603 2681.15,680.96 r180 top value=120K
R52 "RT0603FRE07120KL" RES-0603 3007.92,684.9 r0 top value=120K
R53 "RT0603DRD0727RL" RES-0603 2681.15,488.05 r180 top value=27R
R54 "RT0603DRD0727RL" RES-0603 2681.15,334.5 r180 top value=27R
R55 "RT0603DRD0727RL" RES-0603 2681.15,212.46 r180 top value=27R
R56 "RT0603DRD0727RL" RES-0603 2681.15,558.91 r180 top value=27R
R57 "RT0603DRD0727RL" RES-0603 2681.15,110.09 r180 top value=27R
R58 "RT0603DRD0727RL" RES-0603 2681.15,629.78 r180 top value=27R
R59 "RT0603DRD0727RL" RES-0603 2901.62,684.9 r180 top value=27R
R60 "RT0603FRD07330RL" RES-0603 1338.63,275.45 r90 top value=330R
R61 "RT0603FRD07330RL" RES-0603 1397.68,275.45 r90 top value=330R
R62 "RT0603FRD07330RL" RES-0603 1456.74,275.45 r90 top value=330R
R63 "RT0603FRD07330RL" RES-0603 1515.79,275.45 r90 top value=330R
R64 "RT0603FRD07330RL" RES-0603 1574.85,275.45 r90 top value=330R
R65 "RT0603FRD07330RL" RES-0603 1633.9,275.45 r90 top value=330R
R66 "RT0603FRD07330RL" RES-0603 1692.96,275.45 r90 top value=330R
R67 "RT0603FRD07330RL" RES-0603 1752.01,275.45 r90 top value=330R
TP1 "Test Point 1mm" TESTPOINT-1mm 161.46,1586.47 r0 top value=Value
TP2 "Test Point 1mm" TESTPOINT-1mm 767.76,389.62 r90 top value=Value
TP3 "Test Point 1mm" TESTPOINT-1mm 2425.24,1184.9 r90 top value=Value
TP4 "Test Point 1mm" TESTPOINT-1mm 161.46,1759.7 r90 top value=Value
U1 "TLV62566" SOT23-5 460.67,1791.2 r90 top
U2 "MCP1725-ADJ" SOIC-8_3.9X4.9 480.36,251.83 r0 top
U3 "MCP1725-ADJ" SOIC-8_3.9X4.9 2618.15,1405.37 r180 top
U4 "AT91SAM9N12" BGA0.8P17X17_217_15X15 1692.96,866 r0 top locked
U5 "IS43DR16128C" BGA0.8_DDR2_86_9X12.5 393.74,944.74 r180 top locked
U6 "MT29F1G08ABAEAH4" BGA0.8_FLASH_63_9X11 1259.89,1771.51 r270 top locked
X1 "ECS-120-18-33-JEM-TR" XTAL-ECX32-3.2X2.5 2200.83,1086.47 r90 top value="12 MHz"

## Footprints (in the part's own frame and the unit in brackets; to place one, negate y for a bottom-side part, rotate by r counter-clockwise, add the part's x,y. Pads: shape width x height; smd on the part's side, far side on the other; paste and mask are expansions set on the pad)
104031-0811 [mm] "Memory Card Connectors MICRO SD PUSH-PULL SMT 1.42MM HEIGHT"
  rect 0.75x1.1 smd: 1(2.905,0.25) 2(1.805,0.25) 3(0.705,0.25) 4(-0.395,0.25) 5(-1.495,0.25) 6(-2.595,0.25) 7(-3.695,0.25)
  rect 0.7x1.1 smd: 8(-4.745,0.25)
  rect 1.2x1 smd: 9(5.54,6.4) 10(5.54,10.1)
  rect 1.1x1.8 smd: MP(-6.1,0.6)
  rect 1.9x1.35 smd: MP(-3.93,11.075) MP(2.04,11.075)
  rect 1.55x1.35 smd: MP(5.365,0.375)
  silkscreen extent -6.17,-4 5.77,11.4, body extent -6.2,0 5.75,11.4, height 1.44
BGA0.8_DDR2_86_9X12.5 [mm]
  round 0.35 smd: A1(-3.2,5.6) A2(-2.4,5.6) A3(-1.6,5.6) A7(1.6,5.6) A8(2.4,5.6) A9(3.2,5.6) B1(-3.2,4.8) B2(-2.4,4.8) B3(-1.6,4.8) B7(1.6,4.8) B8(2.4,4.8) B9(3.2,4.8) C1(-3.2,4) C2(-2.4,4) C3(-1.6,4) C7(1.6,4) C8(2.4,4) C9(3.2,4) D1(-3.2,3.2) D2(-2.4,3.2) D3(-1.6,3.2) D7(1.6,3.2) D8(2.4,3.2) D9(3.2,3.2) E1(-3.2,2.4) E2(-2.4,2.4) E3(-1.6,2.4) E7(1.6,2.4) E8(2.4,2.4) E9(3.2,2.4) F1(-3.2,1.6) F2(-2.4,1.6) F3(-1.6,1.6) F7(1.6,1.6) F8(2.4,1.6) F9(3.2,1.6) G1(-3.2,0.8) G2(-2.4,0.8) G3(-1.6,0.8) G7(1.6,0.8) G8(2.4,0.8) G9(3.2,0.8) H1(-3.2,0) H2(-2.4,0) H3(-1.6,0) H7(1.6,0) H8(2.4,0) H9(3.2,0) J1(-3.2,-0.8) J2(-2.4,-0.8) J3(-1.6,-0.8) J7(1.6,-0.8) J8(2.4,-0.8) J9(3.2,-0.8) K2(-2.4,-1.6) K3(-1.6,-1.6) K7(1.6,-1.6) K8(2.4,-1.6) K9(3.2,-1.6) L1(-3.2,-2.4) L2(-2.4,-2.4) L3(-1.6,-2.4) L7(1.6,-2.4) L8(2.4,-2.4) M2(-2.4,-3.2) M3(-1.6,-3.2) M7(1.6,-3.2) M8(2.4,-3.2) M9(3.2,-3.2) N1(-3.2,-4) N2(-2.4,-4) N3(-1.6,-4) N7(1.6,-4) N8(2.4,-4) P2(-2.4,-4.8) P3(-1.6,-4.8) P7(1.6,-4.8) P8(2.4,-4.8) P9(3.2,-4.8) R1(-3.2,-5.6) R2(-2.4,-5.6) R3(-1.6,-5.6) R7(1.6,-5.6) R8(2.4,-5.6)
  silkscreen extent -4.1,-6.3 4.1,6.3, body extent -4.5,-6.25 4.5,6.25, height 1.2
BGA0.8_FLASH_63_9X11 [mm]
  round 0.35 smd: A1(-3.6,4.4) A2(-2.8,4.4) A9(2.8,4.4) A10(3.6,4.4) B1(-3.6,3.6) B9(2.8,3.6) B10(3.6,3.6) C3(-2,2.8) C4(-1.2,2.8) C5(-0.4,2.8) C6(0.4,2.8) C7(1.2,2.8) C8(2,2.8) D3(-2,2) D4(-1.2,2) D5(-0.4,2) D6(0.4,2) D7(1.2,2) D8(2,2) E3(-2,1.2) E4(-1.2,1.2) E5(-0.4,1.2) E6(0.4,1.2) E7(1.2,1.2) E8(2,1.2) F3(-2,0.4) F4(-1.2,0.4) F5(-0.4,0.4) F6(0.4,0.4) F7(1.2,0.4) F8(2,0.4) G3(-2,-0.4) G4(-1.2,-0.4) G5(-0.4,-0.4) G6(0.4,-0.4) G7(1.2,-0.4) G8(2,-0.4) H3(-2,-1.2) H4(-1.2,-1.2) H5(-0.4,-1.2) H6(0.4,-1.2) H7(1.2,-1.2) H8(2,-1.2) J3(-2,-2) J4(-1.2,-2) J5(-0.4,-2) J6(0.4,-2) J7(1.2,-2) J8(2,-2) K3(-2,-2.8) K4(-1.2,-2.8) K5(-0.4,-2.8) K6(0.4,-2.8) K7(1.2,-2.8) K8(2,-2.8) L1(-3.6,-3.6) L2(-2.8,-3.6) L9(2.8,-3.6) L10(3.6,-3.6) M1(-3.6,-4.4) M2(-2.8,-4.4) M9(2.8,-4.4) M10(3.6,-4.4)
  silkscreen extent -4.6,-5.6 4.6,5.6, body extent -4.5,-5.5 4.5,5.5, height 1
BGA0.8P17X17_217_15X15 [mm]
  round 0.35 smd mask+0.06: A1(-6.4,-6.4) A2(-6.4,-5.6) A3(-6.4,-4.8) A4(-6.4,-4) A5(-6.4,-3.2) A6(-6.4,-2.4) A7(-6.4,-1.6) A8(-6.4,-0.8) A9(-6.4,0) A10(-6.4,0.8) A11(-6.4,1.6) A12(-6.4,2.4) A13(-6.4,3.2) A14(-6.4,4) A15(-6.4,4.8) A16(-6.4,5.6) A17(-6.4,6.4) B1(-5.6,-6.4) B2(-5.6,-5.6) B3(-5.6,-4.8) B4(-5.6,-4) B5(-5.6,-3.2) B6(-5.6,-2.4) B7(-5.6,-1.6) B8(-5.6,-0.8) B9(-5.6,0) B10(-5.6,0.8) B11(-5.6,1.6) B12(-5.6,2.4) B13(-5.6,3.2) B14(-5.6,4) B15(-5.6,4.8) B16(-5.6,5.6) B17(-5.6,6.4) C1(-4.8,-6.4) C2(-4.8,-5.6) C3(-4.8,-4.8) C4(-4.8,-4) C5(-4.8,-3.2) C6(-4.8,-2.4) C7(-4.8,-1.6) C8(-4.8,-0.8) C9(-4.8,0) C10(-4.8,0.8) C11(-4.8,1.6) C12(-4.8,2.4) C13(-4.8,3.2) C14(-4.8,4) C15(-4.8,4.8) C16(-4.8,5.6) C17(-4.8,6.4) D1(-4,-6.4) D2(-4,-5.6) D3(-4,-4.8) D4(-4,-4) D5(-4,-3.2) D6(-4,-2.4) D7(-4,-1.6) D8(-4,-0.8) D9(-4,0) D10(-4,0.8) D11(-4,1.6) D12(-4,2.4) D13(-4,3.2) D14(-4,4) D15(-4,4.8) D16(-4,5.6) D17(-4,6.4) E1(-3.2,-6.4) E2(-3.2,-5.6) E3(-3.2,-4.8) E4(-3.2,-4) E14(-3.2,4) E15(-3.2,4.8) E16(-3.2,5.6) E17(-3.2,6.4) F1(-2.4,-6.4) F2(-2.4,-5.6) F3(-2.4,-4.8) F4(-2.4,-4) F14(-2.4,4) F15(-2.4,4.8) F16(-2.4,5.6) F17(-2.4,6.4) G1(-1.6,-6.4) G2(-1.6,-5.6) G3(-1.6,-4.8) G4(-1.6,-4) G14(-1.6,4) G15(-1.6,4.8) G16(-1.6,5.6) G17(-1.6,6.4) H1(-0.8,-6.4) H2(-0.8,-5.6) H3(-0.8,-4.8) H4(-0.8,-4) H8(-0.8,-0.8) H9(-0.8,0) H10(-0.8,0.8) H14(-0.8,4) H15(-0.8,4.8) H16(-0.8,5.6) H17(-0.8,6.4) J1(0,-6.4) J2(0,-5.6) J3(0,-4.8) J4(0,-4) J8(0,-0.8) J9(0,0) J10(0,0.8) J14(0,4) J15(0,4.8) J16(0,5.6) J17(0,6.4) K1(0.8,-6.4) K2(0.8,-5.6) K3(0.8,-4.8) K4(0.8,-4) K8(0.8,-0.8) K9(0.8,0) K10(0.8,0.8) K14(0.8,4) K15(0.8,4.8) K16(0.8,5.6) K17(0.8,6.4) L1(1.6,-6.4) L2(1.6,-5.6) L3(1.6,-4.8) L4(1.6,-4) L14(1.6,4) L15(1.6,4.8) L16(1.6,5.6) L17(1.6,6.4) M1(2.4,-6.4) M2(2.4,-5.6) M3(2.4,-4.8) M4(2.4,-4) M14(2.4,4) M15(2.4,4.8) M16(2.4,5.6) M17(2.4,6.4) N1(3.2,-6.4) N2(3.2,-5.6) N3(3.2,-4.8) N4(3.2,-4) N14(3.2,4) N15(3.2,4.8) N16(3.2,5.6) N17(3.2,6.4) P1(4,-6.4) P2(4,-5.6) P3(4,-4.8) P4(4,-4) P5(4,-3.2) P6(4,-2.4) P7(4,-1.6) P8(4,-0.8) P9(4,0) P10(4,0.8) P11(4,1.6) P12(4,2.4) P13(4,3.2) P14(4,4) P15(4,4.8) P16(4,5.6) P17(4,6.4) R1(4.8,-6.4) R2(4.8,-5.6) R3(4.8,-4.8) R4(4.8,-4) R5(4.8,-3.2) R6(4.8,-2.4) R7(4.8,-1.6) R8(4.8,-0.8) R9(4.8,0) R10(4.8,0.8) R11(4.8,1.6) R12(4.8,2.4) R13(4.8,3.2) R14(4.8,4) R15(4.8,4.8) R16(4.8,5.6) R17(4.8,6.4) T1(5.6,-6.4) T2(5.6,-5.6) T3(5.6,-4.8) T4(5.6,-4) T5(5.6,-3.2) T6(5.6,-2.4) T7(5.6,-1.6) T8(5.6,-0.8) T9(5.6,0) T10(5.6,0.8) T11(5.6,1.6) T12(5.6,2.4) T13(5.6,3.2) T14(5.6,4) T15(5.6,4.8) T16(5.6,5.6) T17(5.6,6.4) U1(6.4,-6.4) U2(6.4,-5.6) U3(6.4,-4.8) U4(6.4,-4) U5(6.4,-3.2) U6(6.4,-2.4) U7(6.4,-1.6) U8(6.4,-0.8) U9(6.4,0) U10(6.4,0.8) U11(6.4,1.6) U12(6.4,2.4) U13(6.4,3.2) U14(6.4,4) U15(6.4,4.8) U16(6.4,5.6) U17(6.4,6.4)
  silkscreen extent -7.6,-7.6 7.6,7.6, body extent -7.5,-7.5 7.5,7.5, height 0.86
CAP-0603 [mm]
  rect 0.75x0.9 smd: 1(-0.7,0) 2(0.7,0)
  silkscreen extent -1.25,-0.65 1.25,0.65, body extent -0.8,-0.4 0.8,0.4, height 0.95
CAP-0805 [mm]
  rect 0.9x1.3 smd: 1(-0.9,0) 2(0.9,0)
  silkscreen extent -1.55,-0.85 1.55,0.85, body extent -1,-0.63 1,0.63, height 1.35
FUS-0ZCH-3x2.35 [mm]
  rect 1.18x2.81 smd: 1(-1.485,0) 2(1.485,0)
  silkscreen extent -2.3,-1.6 2.3,1.6, body extent -1.61,-1.29 1.61,1.29, height 0.75
"HEADER-2X2-2.54-SMD- 10129383" [mm]
  rect 1.27x3.18 smd: 1(-1.27,-2.54)
  rrect50% 1.27x3.18 smd: 2(-1.27,2.54) 3(1.27,-2.54) 4(1.27,2.54)
  silkscreen extent -2.9,-3.5 2.4,2.6
"HEADER-5X2-2.54-SMD- 10129383" [mm]
  rect 1.27x3.18 smd: 1(-5.08,-2.54)
  rrect50% 1.27x3.18 smd: 2(-5.08,2.54) 3(-2.54,-2.54) 4(-2.54,2.54) 5(0,-2.54) 6(0,2.54) 7(2.54,-2.54) 8(2.54,2.54) 9(5.08,-2.54) 10(5.08,2.54)
  silkscreen extent -6.7,-3.5 6.2,2.6
LED-SMD-0603-1.6X0.8 [mm]
  rect 0.8x0.8 smd: 1(-0.8,0) 2(0.8,0)
  silkscreen extent -1.4,-0.6 1.65,0.6, body extent -0.83,-0.4 0.77,0.4, height 0.7
NRS5020-SMT-INDUCTOR [mm]
  rect 1.5x4 smd: 1(-1.8,0) 2(1.8,0)
  silkscreen extent -2.5,-2.5 2.5,2.5, body extent -2.5,-2.5 2.5,2.5, height 2
RES-0603 [mm]
  rect 0.75x0.9 smd: 1(-0.8,0) 2(0.8,0)
  silkscreen extent -1.35,-0.65 1.35,0.65, body extent -0.8,-0.4 0.8,0.4, height 0.55
SOIC-8_3.9X4.9 [mm]
  rect 1.525x0.65 smd: 1(-2.712,1.905)
  rrect50% 1.525x0.65 smd: 2(-2.712,0.635) 3(-2.712,-0.635) 4(-2.712,-1.905) 5(2.712,-1.905) 6(2.712,-0.635) 7(2.712,0.635) 8(2.712,1.905)
  silkscreen extent -1.6,-2.45 1.6,2.45, body extent -3,-2.45 3,2.45, height 1.75
SOT23-5 [mm]
  rect 1.1x0.6 smd: 1(-1.3,0.95)
  oval 1.1x0.6 smd: 2(-1.3,0) 3(-1.3,-0.95) 4(1.3,-0.95) 5(1.3,0.95)
  silkscreen extent -1.2,-1.5 0.6,1.9, body extent -1.4,-1.45 1.4,1.45, height 1.45
TESTPOINT-1mm [mm]
  round 1 smd: 1(0,0)
  silkscreen extent -0.75,-0.75 0.75,0.75
UJ2-MIBH-G-SMT-TR [mm]
  rect 0.3x1.35 smd: 1(-1.3,2.675) 5(1.3,2.675)
  rect 0.4x1.35 smd: 2(-0.65,2.675) 3(0,2.675) 4(0.65,2.675)
  round 0.275 hole 0.55 unplated: MH1(-2,2.15) MH2(2,2.15)
  rect 1.9x1.9 smd: SH(-3.95,0) SH(-1.2,0) SH(1.2,0) SH(3.95,0)
  silkscreen extent -3.9,-2.78 3.9,3.5, body extent -4.05,-2.76 4.05,2.88, height 2.69
XTAL-ECX32-3.2X2.5 [mm]
  rrect50% 1.3x1.1 smd: 1(-1.15,-0.9)
  rect 1.3x1.1 smd: 2(1.15,-0.9) 3(1.15,0.9) 4(-1.15,0.9)
  silkscreen extent -2.1,-1.7 2.1,1.7, body extent -1.69,-1.34 1.69,1.34, height 0.9

## Part data
C1 C2 C3 C5 C6 C7 C8 C9 C11 C13 C14 C20 C24 C28 C39 C49 C51 C56 C57 C58: library part CAP-0805-4.7u-885012107013_2, "Multilayer Ceramic Capacitors MLCC - SMD/SMT WCAP-CSGP 4.7uF 0805 20% 16V MLCC", Manufacturer="Wurth Elektronik", Supplier Part Number 1=710-885012107013, Voltage Rating DC="16 VDC", Supplier 1=Mouser
C4 C10 C16 C17 C18 C19 C21 C22 C23 C25 C26 C27 C29 C30 C31 C32 C33 C34 C35 C36 C40 C41 C42 C43 C44 C45 C46 C47 C48 C50 C52 C53 C54 C55: library part CAP-0603-100n-C0603C104M4RAC, "Multilayer Ceramic Capacitors MLCC - SMD/SMT 16V 0.1uF X7R 0603 20%", Manufacturer=KEMET, Supplier Part Number 1=80-C0603C104M4RAC, Voltage Rating DC="16 VDC", Supplier 1=Mouser
C12 C15: library part CAP-0603-1n-C0603C102J5RACTU, "Multilayer Ceramic Capacitors MLCC - SMD/SMT 50V 1000pF X7R 0603 5%", Manufacturer=KEMET, Supplier Part Number 1=80-C0603C102J5R, Voltage Rating DC="50 VDC", Supplier 1=Mouser
C37 C38: library part CAP-0603-33p-885012006054, "Multilayer Ceramic Capacitors MLCC - SMD/SMT WCAP-CSGP 33pF 0603 5% 50V MLCC", Manufacturer="Wurth Elektronik", Supplier Part Number 1=710-885012006054, Voltage Rating DC="50 VDC", Supplier 1=Mouser
D1 D2: library part DIODE-TVS-PGB102ST23, "ESD Suppressors / TVS Diodes 2 Ch TVS Diode Array 3.3V 6.0A 400mW", Supplier Part Number 1=621-D1213A-02SM-7, Supplier 1=Mouser
D3 D4 D5 D6 D7 D8 D9 D10: library part LED-SMD-0603-Green-150060VS75000, "Standard LEDs - SMD WL-SMCW SMDMono TpVw Waterclr 0603 BrtGrn", Supplier Part Number 1=710-150060VS75000, Supplier 1=Mouser
F1 F2: library part PPTC-500mA-16V-0ZCH0050FF2G, "Resettable Fuses - PPTC Fuse", Manufacturer=Bel, Maximum Voltage=16V, Supplier Part Number 1=530-0ZCH0050FF2G, Supplier 1=Mouser
J1 J3: library part UJ2-MIBH-G-SMT-TR, "USB Connectors Micro B, USB 2.0, 1.8 A, Right Angle, Surface Mount (SMT), USB Receptacle", Supplier Part Number 1=490-UJ2-MIBH-G-SMTTR, Supplier 1=Mouser
J2: library part HEADER-5x2-2.54-SMD-10129383-910002ALF, "Headers & Wire Housings ECONOSTIK HEADER DR VT SMT 2X5", Supplier Part Number 1=649-1012938391002ALF, Supplier 1=Mouser
J4: library part HEADER-2x2-2.54-SMD-10129383-904001ALF, "Headers & Wire Housings ECONOSTIK HEADER DR VT SMT 2X2", Supplier Part Number 1=649-1012938390401ALF, Supplier 1=Mouser
J5: library part 104031-0811, "Memory Card Connectors MICRO SD PUSH-PULL SMT 1.42MM HEIGHT", Supplier Part Number 1=538-104031-0811, Supplier 1=Mouser
L1: library part IND-NRS5020T2R2NMG5, "Fixed Inductors 5020 2.2uH 42mOhms +/-30%Tol 2900mA", Supplier Part Number 1=963-NRS5020T2R2NMGJ, Supplier 1=Mouser
R1: library part RES-0603-412K-RT0603FRE07412KL, "Thin Film Resistors - SMD 1/10W 412K ohm 1% 50ppm", Manufacturer=Yageo, Supplier Part Number 1=603-RT0603FRE07412KL, Supplier 1=Mouser
R2 R4 R5 R7 R8 R9 R25 R26 R32 R33 R34 R35 R47 R48 R49 R50 R51 R52: library part RES-0603-120K-RT0603FRE07120KL, "Thin Film Resistors - SMD 1/10W 120K ohm 1% 50ppm", Manufacturer=Yageo, Supplier Part Number 1=603-RT0603FRE07120KL, Supplier 1=Mouser
R3: library part RES-0603-536K-RT0603FRE07536KL, "Thin Film Resistors - SMD 1/10W 536K ohm 1% 50ppm", Manufacturer=Yageo, Supplier Part Number 1=603-RT0603FRE07536KL, Supplier 1=Mouser
R6: library part RES-0603-174K-RT0603FRE07174KL, "Thin Film Resistors - SMD 1/10W 174K ohm 1% 50ppm", Manufacturer=Yageo, Supplier Part Number 1=603-RT0603FRE07174KL, Supplier 1=Mouser
R10 R11 R12 R13 R14 R15 R16 R17 R18 R19 R20 R23 R24 R27 R29 R45 R46 R60 R61 R62 R63 R64 R65 R66 R67: library part RES-0603-330R-RT0603FRD07330RL, "Thin Film Resistors - SMD 1/10W 330 ohm 1% 50ppm", Manufacturer=Yageo, Supplier Part Number 1=603-RT0603FRD07330RL, Supplier 1=Mouser
R21 R22 R28 R30 R31 R36 R37 R38 R39 R40 R41 R42 R43 R44 R53 R54 R55 R56 R57 R58 R59: library part RES-0603-27R-RT0603DRD0727RL, "Thin Film Resistors - SMD 1/10W 27 ohm 1% 50ppm", Manufacturer=Yageo, Supplier Part Number 1=603-RT0603DRD0727RL, Supplier 1=Mouser
TP1 TP2 TP3 TP4: library part TESTPOINT-1mm
U1: "TLV6256x 1.5-A High Efficiency Step-Down Converters in SOT-23 5-Pin Package", Supplier Part Number 1=595-TLV62566DBVR, Supplier 1=Mouser
U2 U3: "500 mA, Low Voltage, Low Quiescent Current LDO Regulator", Supplier Part Number 1=579-MCP1725-ADJE/SN, Supplier 1=Mouser
U4: "MPU ARM926EJ-S 400MHz", Supplier Part Number 1=556-AT91SAM9N12-CU, Supplier 1=Mouser
U5: library part ISSI-DDR2-IS43DR16128C, "256Mx8, 128Mx16 DDR2 DRAM", Supplier Part Number 1=870-3DR16128C-25DBLI, Supplier 1=Mouser
U6: library part MICRON-FLASH-MT29F1G08ABAEAH4, "NAND Flash SLC 1G 128MX8 VFBGA-63", Supplier Part Number 1=340-139663-TRAY, Supplier 1=Mouser
X1: library part XTAL-12MHz-ECS-120-18-33-JEM-TR, "Crystals 12MHz 20ppm 18pF -20C +70C", Shunt Capacitance="18 pF", Supplier Part Number 1=520-120-18-33-JEMT, Supplier 1=Mouser

## Free pads (board coordinates)
  round 0 hole 196.85: 3(3188.98,1929.13)

## Via types
v1: diameter 17.72, hole 7.87, L1 (TOP) to L4 (BOTTOM), 310 vias
v2: diameter 13.78, hole 3.94, L1 (TOP) to L3 (PWR), 7 vias
v3: diameter 17.72, hole 7.87, L1 (TOP) to L3 (PWR), 5 vias
v4: diameter 13.78, hole 3.94, L2 (GND) to L4 (BOTTOM), 3 vias
v5: diameter 13.78, hole 3.94, L3 (PWR) to L4 (BOTTOM), 1 vias

## Nets (pads, with @x,y where several pads share a name; then routed paths per layer and width w, separated by ;. In a path a pad name is that pad's centre, name@x,y a point inside that pad or via, vN(x,y) a via of type N, cw(c..) or ccw(c..) an arc to the next point about the centre after c; other vN are vias at no path point)
1V0_PG: R9.1 R12.1 U3.5 | length 882.6
  L1 (TOP) w7.87: R12.1@2448.82,838.58 2451.82,839.43 2487.25,839.43 2506.93,859.11 v1(2506.93,896.51) ; R9.1@2511.81,1547.24 2511.34,1480.51 2514.81,1481.16 2562.05,1481.16 2627.01,1416.2 2627.01,1022.5 v1(2601.42,996.91)
  L4 (BOTTOM) w7.87: v1(2506.93,896.51) 2601.42,991 v1(2601.42,996.91)
1V8_PG: R7.1 U2.5 U3.3 | length 179.6
  L1 (TOP) w7.87: R7.1@2700.79,1547.24 2701.82,1530.37 2672.29,1500.84 2672.29,1433.91 2674.26,1431.94 2723.47,1431.94 U3.3@2724.88,1430.51
3V3_PG: C10.2 R2.1 U1.1 U2.3 | length 2131.3
  L1 (TOP) w7.87: U2.3@373.54,226.97 377.01,227.22 424.26,227.22 461.66,189.82 461.66,113.05 460.63,110.24 R2.1@503.94,110.24 ; U1.1@423.23,1740.16 422.29,1741 388.82,1741 345.52,1697.69 215.59,1697.69 71.89,1553.99 71.89,709.5 426.22,355.17 426.22,225.25
+1V0: C14.2 C16.2 C17.2 C18.2 C19.2 C20.2 C33.2 R6.2 TP3.1 U3.8 U4.C8 U4.G15 U4.J4 U4.P10 U4.T16 | length 3368.3
  L1 (TOP) w3.54: v1(1488.19,850.39) U4.C8@1503.94,834.65 ; v3(1614.17,1070.87) U4.G15@1629.92,1055.12 ; U4.J4@1692.91,708.66 v1(1708.66,692.91) ; U4.P10@1850.39,897.64 v3(1866.14,913.39) ; U4.T16@1913.39,1086.61 v3(1929.13,1102.36)
  L1 (TOP) w15.75: v1(1977.41,1172.1) 2083.7,1172.1 2148.67,1237.06 2390.79,1237.06 2398.67,1229.19 2465.59,1229.19 ; TP3.1@2425.2,1185.04 2428.19,1185.88 2463.63,1185.88 2465.59,1187.85 2465.59,1229.19 ; R6.2@2425.2,1267.72 2428.19,1268.56 2465.59,1268.56 ; v1(2511.34,1330.51) C14.2@2512.84,1268.56 ; C14.2@2515.75,1259.84 C14.2@2512.84,1268.56 ; 2465.59,1229.19 2465.59,1268.56 ; 2465.59,1268.56 C14.2@2512.84,1268.56
  L2 (GND) w15.75: v1@1489.22,851.24 1489.22,798.09 1593.55,693.76 v1@1709.69,693.76 ; v1(1857.33,906.35) 1865.2,914.23 v3@1867.17,914.23 ; v1@1900.63,1185.88 v1(1906.54,1185.88) 1912.44,1191.79 1943.94,1191.79 1963.63,1172.1 v1(1977.41,1172.1)
  L3 (PWR) w4.72: v1@1709.69,693.76 1906.54,693.76
  L3 (PWR) w15.75: v3@1615.2,1071.71 1623.07,1071.71 1686.07,1008.72 1686.07,987.06 1684.1,985.09 1684.1,981.16 1682.13,979.19 1682.13,973.28 1650.63,941.79 1650.63,918.17 1733.31,835.49 1843.55,835.49 1863.23,855.17 2014.81,855.17 2028.59,868.95 ; v3@1867.17,914.23 1940,914.23 1957.72,896.51 1957.72,892.57 1969.53,880.76 2038.43,880.76 2176.22,1018.56 2182.13,1018.56 2211.66,1048.09 2211.66,1067.77 2290.4,1146.51 2290.4,1148.48 ; 1906.54,693.76 2028.59,815.8 2028.59,872.89 2036.46,880.76 ; v1(1906.54,1185.88) 1900.63,1179.98 1900.63,1152.42 1930.16,1122.89 v3@1930.16,1103.2
  L4 (BOTTOM) w7.87: 1871.11,1107.14 1871.11,1109.11 1877.01,1115.02
  L4 (BOTTOM) w8.98: 1871.11,1105.17 1871.11,1107.14
  L4 (BOTTOM) w9.2: 1877.01,1115.02 1877.01,1116.98
  L4 (BOTTOM) w10.08: 1871.11,1103.2 1871.11,1105.17
  L4 (BOTTOM) w10.31: 1877.01,1116.98 1877.01,1118.95
  L4 (BOTTOM) w11.18: 1871.11,1101.24 1871.11,1103.2
  L4 (BOTTOM) w11.41: 1877.01,1118.95 1877.01,1120.92
  L4 (BOTTOM) w12.28: 1871.11,1099.27 1871.11,1101.24
  L4 (BOTTOM) w12.51: 1877.01,1120.92 1877.01,1122.89
  L4 (BOTTOM) w13.39: 1871.11,1097.3 1871.11,1099.27
  L4 (BOTTOM) w13.61: 1877.01,1122.89 1877.01,1124.86
  L4 (BOTTOM) w14.49: 1871.11,1095.33 1871.11,1097.3
  L4 (BOTTOM) w14.72: 1877.01,1124.86 1877.01,1126.83
  L4 (BOTTOM) w15.59: 1871.11,1093.36 1871.11,1095.33
  L4 (BOTTOM) w15.75: v1@1489.22,851.24 1497.09,843.36 1497.09,790.21 C17.2@1496.06,787.4 ; C18.2@1688.98,661.42 1690,674.07 v1@1709.69,693.76 ; v1(1857.33,906.35) 1857.33,868.95 1859.3,866.98 1896.7,866.98 C19.2@1897.64,866.14 ; C33.2@1866.14,1070.87 1871.11,1075.65 1871.11,1093.36 ; 1877.01,1126.83 1877.01,1140.61 1900.63,1164.23 1900.63,1178.01 ; v1@1900.63,1179.98 v1@1900.63,1185.88
+1V8: C11.2 C21.2 C22.2 C23.2 C24.2 C39.2 C40.2 C41.2 C42.2 C43.2 C44.2 C45.2 C46.2 C47.2 C48.2 C49.2 R1.2 R23.2 TP2.1 U2.8 U4.H8 U4.H9 U4.H10 U5.A1 U5.A9 U5.C1 U5.C3 U5.C7 U5.C9 U5.E1 U5.E9 U5.G1 U5.G3 U5.G7 U5.G9 U5.J1 U5.J9 U5.M9 U5.R1 | length 3683.6
  L1 (TOP) w3.54: v1(204.72,1263.78) C42.2@232.28,1236.22 ; v1(251.97,708.66) U5.A9@267.72,724.41 ; v1(251.97,771.65) U5.C9@267.72,787.4 ; v1(251.97,834.65) U5.E9@267.72,850.39 ; v1(251.97,897.64) U5.G9@267.72,913.39 ; v1(251.97,1055.12) U5.M9@267.72,1070.87 ; v3(314.96,803.15) U5.C7@330.71,787.4 ; v1(314.96,929.13) U5.G7@330.71,913.39 ; v1(488.19,1208.66) C41.2@515.75,1236.22 ; U5.A1@519.69,724.41 v1(535.43,708.66)
  L1 (TOP) w7.87: v1@400.63,951.63 436.07,916.2 451.82,916.2 U5.G3@456.69,913.39 ; U5.J1@519.69,976.38 520.71,983.13 530.56,992.97 573.86,992.97 587.64,979.19 587.64,967.38 585.67,965.41 585.67,963.44 587.64,961.47 ; 652.6,955.57 737.25,1040.21 ; v1(849.45,571.71) 849.45,565.8 1001.03,414.23 1353.39,414.23 1524.65,585.49 1550.24,585.49 v1(1554.18,589.43)
  L1 (TOP) w9.2: v1@400.63,951.63 v1@400.63,953.6 ; 650.63,955.57 652.6,955.57
  L1 (TOP) w9.43: 587.64,961.47 589.61,959.5 ; 737.25,1040.21 739.22,1042.18
  L1 (TOP) w10.31: v1@400.63,953.6 v1@400.63,955.57 ; 648.67,955.57 650.63,955.57
  L1 (TOP) w10.99: 589.61,959.5 591.58,957.54 ; 739.22,1042.18 741.19,1044.15
  L1 (TOP) w11.41: v1@400.63,955.57 v1@400.63,957.54 ; 646.7,955.57 648.67,955.57
  L1 (TOP) w12.51: v1@400.63,957.54 v1(400.63,959.5) ; 644.73,955.57 646.7,955.57
  L1 (TOP) w12.55: 591.58,957.54 593.55,955.57 ; 741.19,1044.15 743.15,1046.12
  L1 (TOP) w13.61: 642.76,955.57 644.73,955.57
  L1 (TOP) w13.78: U4.H9@1661.42,866.14 U4.H9@1662.44,866.98
  L1 (TOP) w13.88: 593.55,955.57 595.52,955.57
  L1 (TOP) w14.11: 743.15,1046.12 745.12,1048.09
  L1 (TOP) w14.72: 640.79,955.57 642.76,955.57
  L1 (TOP) w14.98: 595.52,955.57 597.48,955.57
  L1 (TOP) w15.67: 745.12,1048.09 747.09,1050.06
  L1 (TOP) w15.75: C40.2@169.29,700.79 211.66,701.63 219.53,709.5 v1@253,709.5 ; C39.2@354.33,1236.22 396.7,1237.06 453.78,1294.15 589.61,1294.15 595.52,1288.24 595.52,1268.56 ; v1(424.26,679.98) 440,679.98 459.69,660.29 C45.2@460.63,657.48 ; C41.2@515.75,1236.22 516.78,1237.06 554.18,1237.06 585.67,1268.56 595.52,1268.56 ; v1@536.46,709.5 573.86,709.5 579.77,715.41 617.17,715.41 C44.2@618.11,716.54 ; 597.48,955.57 640.79,955.57 ; v1(673.23,389.76) TP2.1@767.72,389.76 ; C46.2@673.23,996.06 C46.2@682.13,985.09 ; C48.2@677.17,1122.05 C48.2@682.13,1122.89 ; R23.2@681.1,1066.93 C48.2@682.13,1122.89 ; 747.09,1050.06 772.68,1075.65 776.62,1075.65 788.43,1087.46 788.43,1211.47 774.65,1225.25 749.06,1225.25 705.75,1268.56 595.52,1268.56 ; 788.43,1115.02 743.15,1115.02 740.16,1114.17 C48.2@682.13,1122.89 ; U4.H8@1661.42,834.65 U4.H9@1662.44,866.98
  L3 (PWR) w7.87: v1(849.45,571.71) 849.45,798.09 ; v1(1554.18,589.43) 1719.53,754.78 1719.53,770.53 1717.56,772.5 1717.56,780.37 1640.79,857.14 v1(1609.3,857.14)
  L4 (BOTTOM) w15.75: v1@253,709.5 253,719.35 254.96,721.31 254.96,770.53 v1@253,772.5 ; v1@253,835.49 254.96,837.46 254.96,886.67 253,888.64 v1@253,898.48 ; v1(1609.3,857.14) 1609.3,865.02 1622.05,877.95 C24.2@1622.05,767.72
  other v1: 587.09,326.97 582.68,397.64 240.16,606.3 267.72,976.38 165.35,1110.24